# Altium PCB ActuatorMKII.PcbDoc (part 1 of 3)
Units mil, origin at the board's own origin, x right, y up, seen from the top; angles counter-clockwise.
Board outline 7000 x 5000 mil, 4 copper layers (Top Layer, Middle 1 Layer, Middle 2 Layer, Bottom Layer), stack 53.912 mil thick; 139 components, 107 nets, 485 pads, 302 vias.
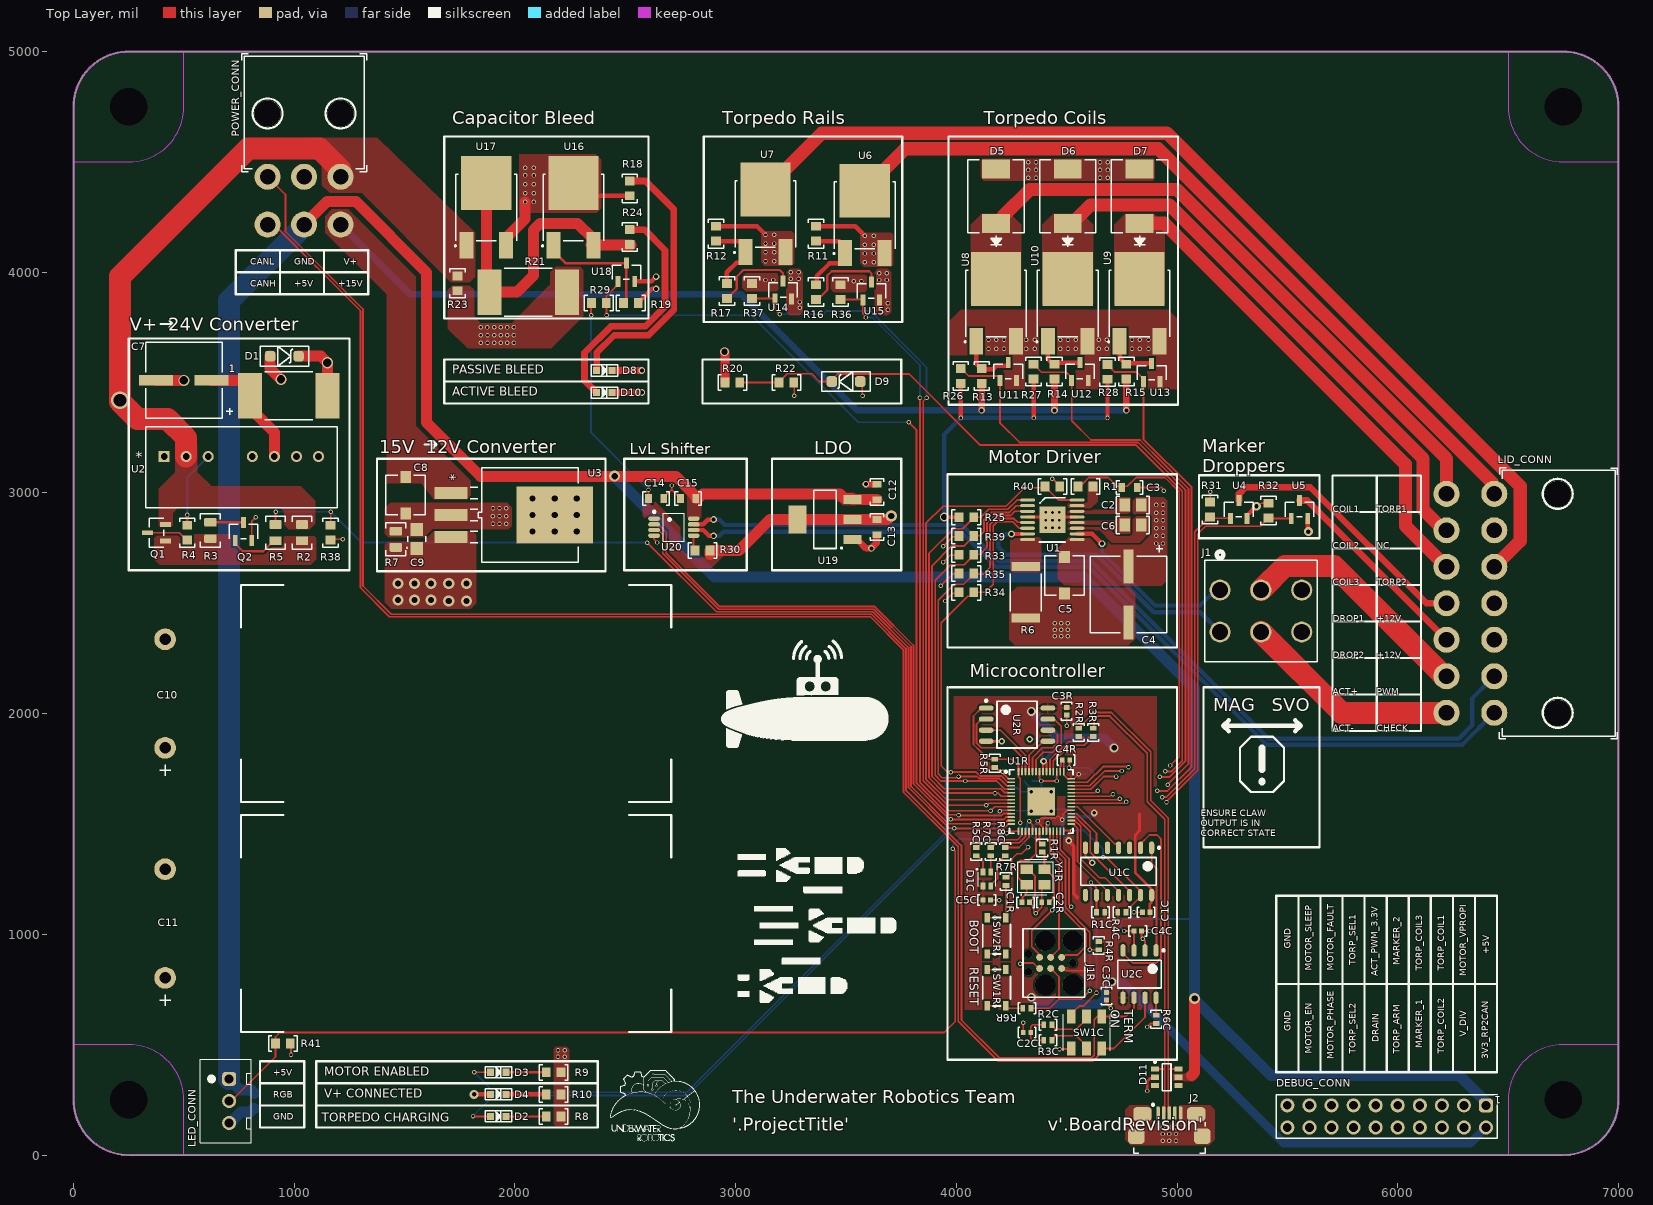
[diagram p0: Top Layer view]
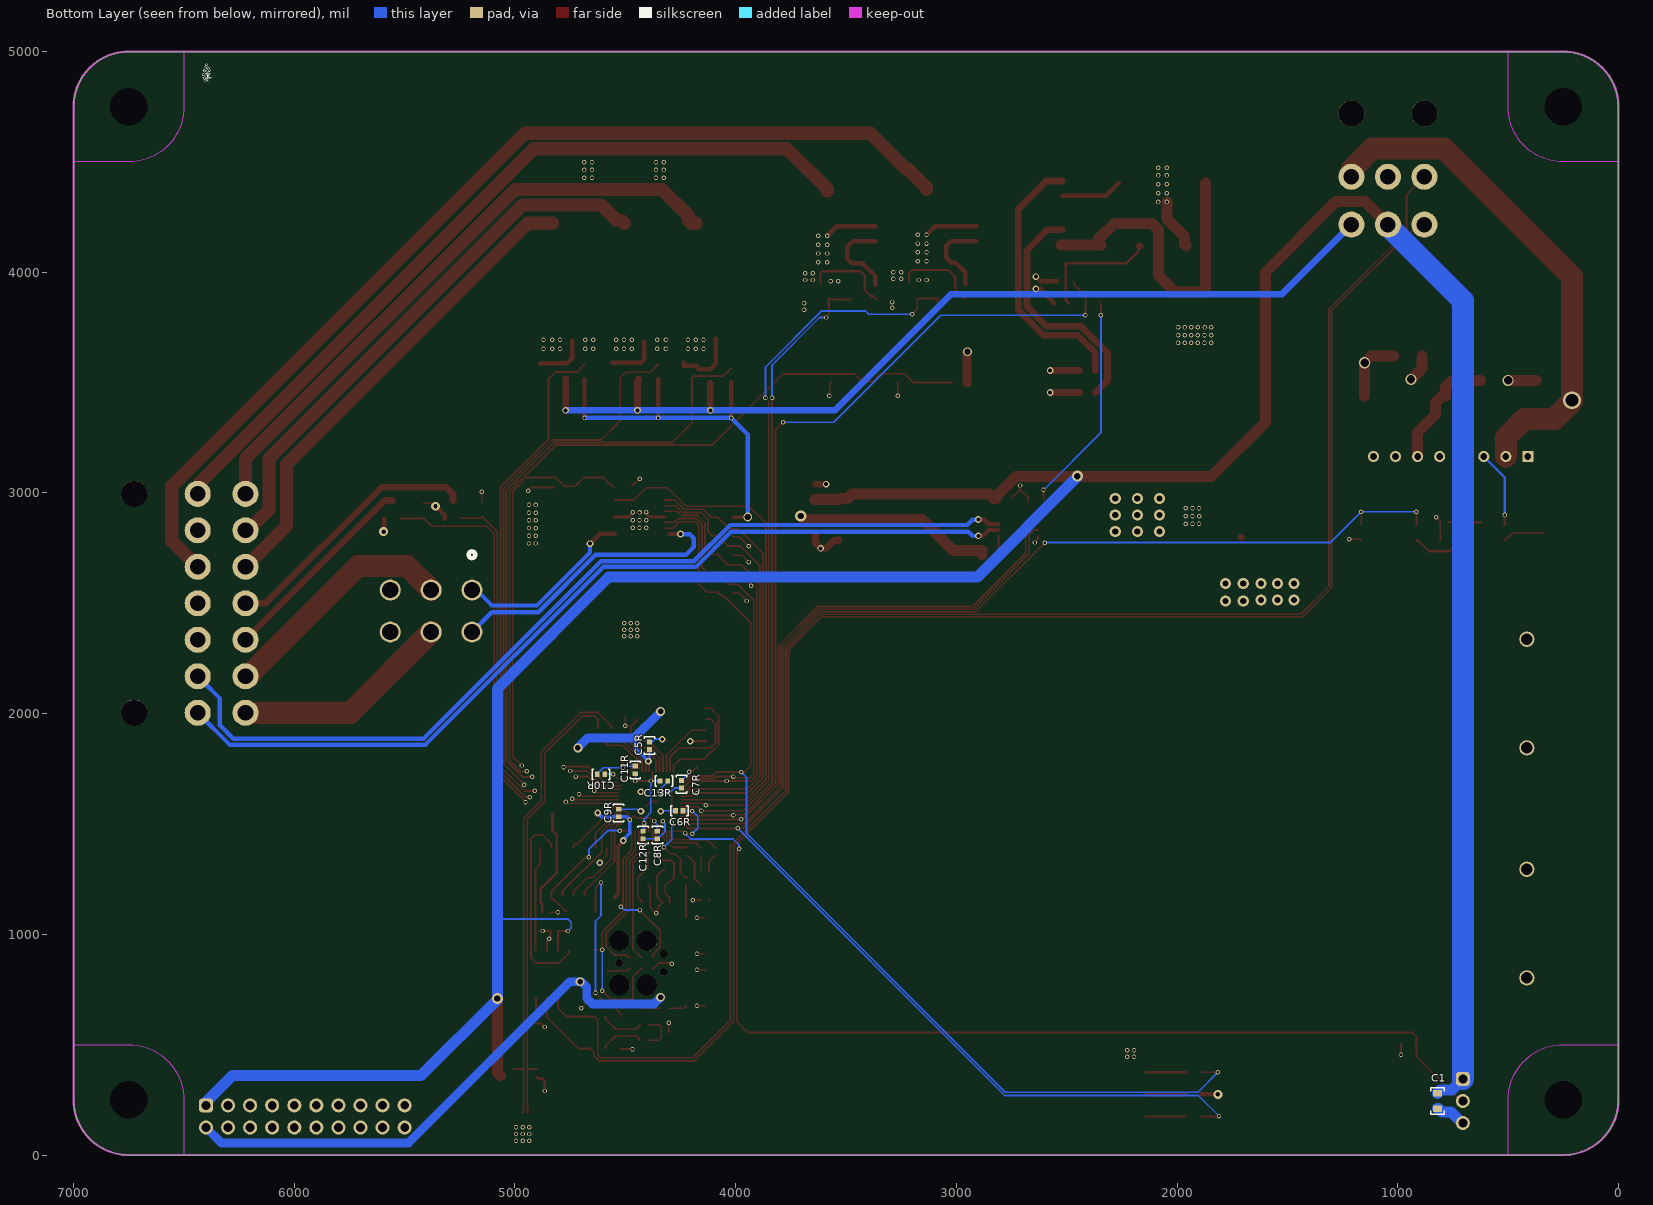
[diagram p1: Bottom Layer view, seen from below]
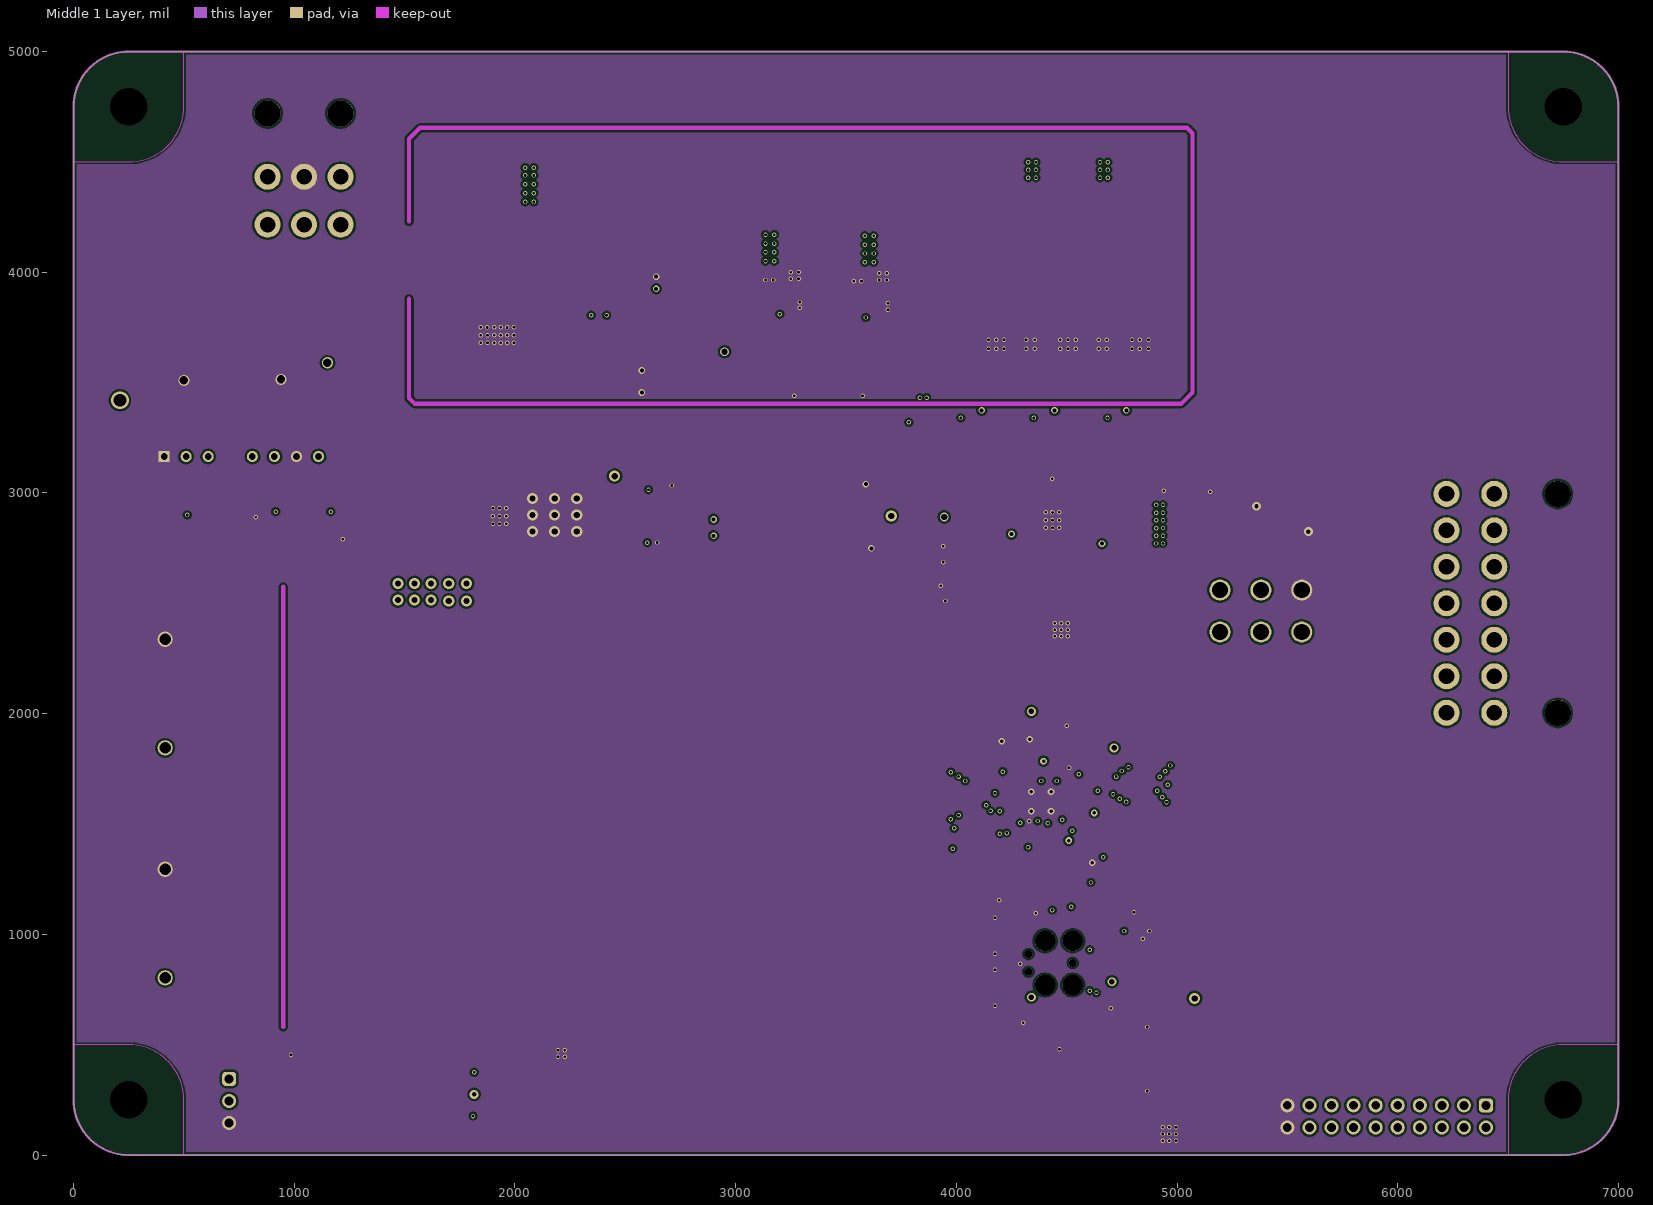
[diagram p2: Middle 1 Layer]
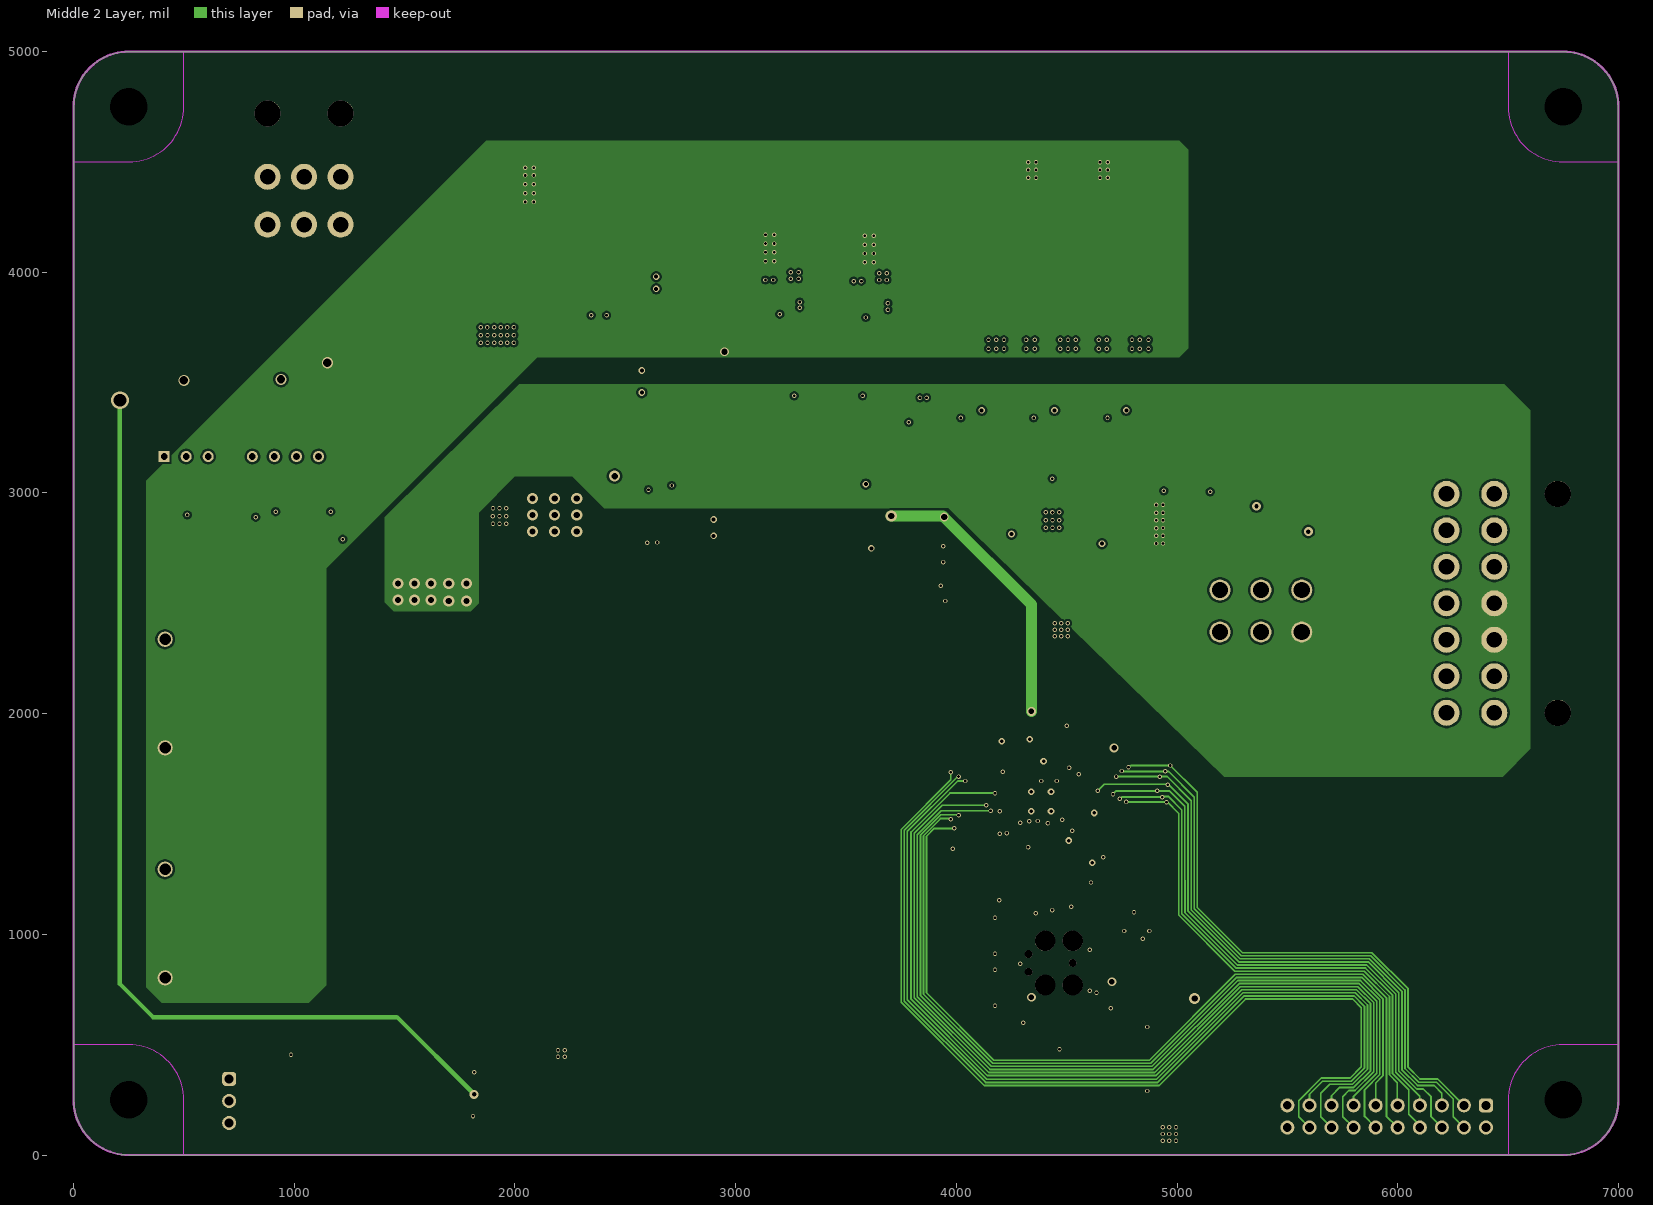
[diagram p3: Middle 2 Layer]
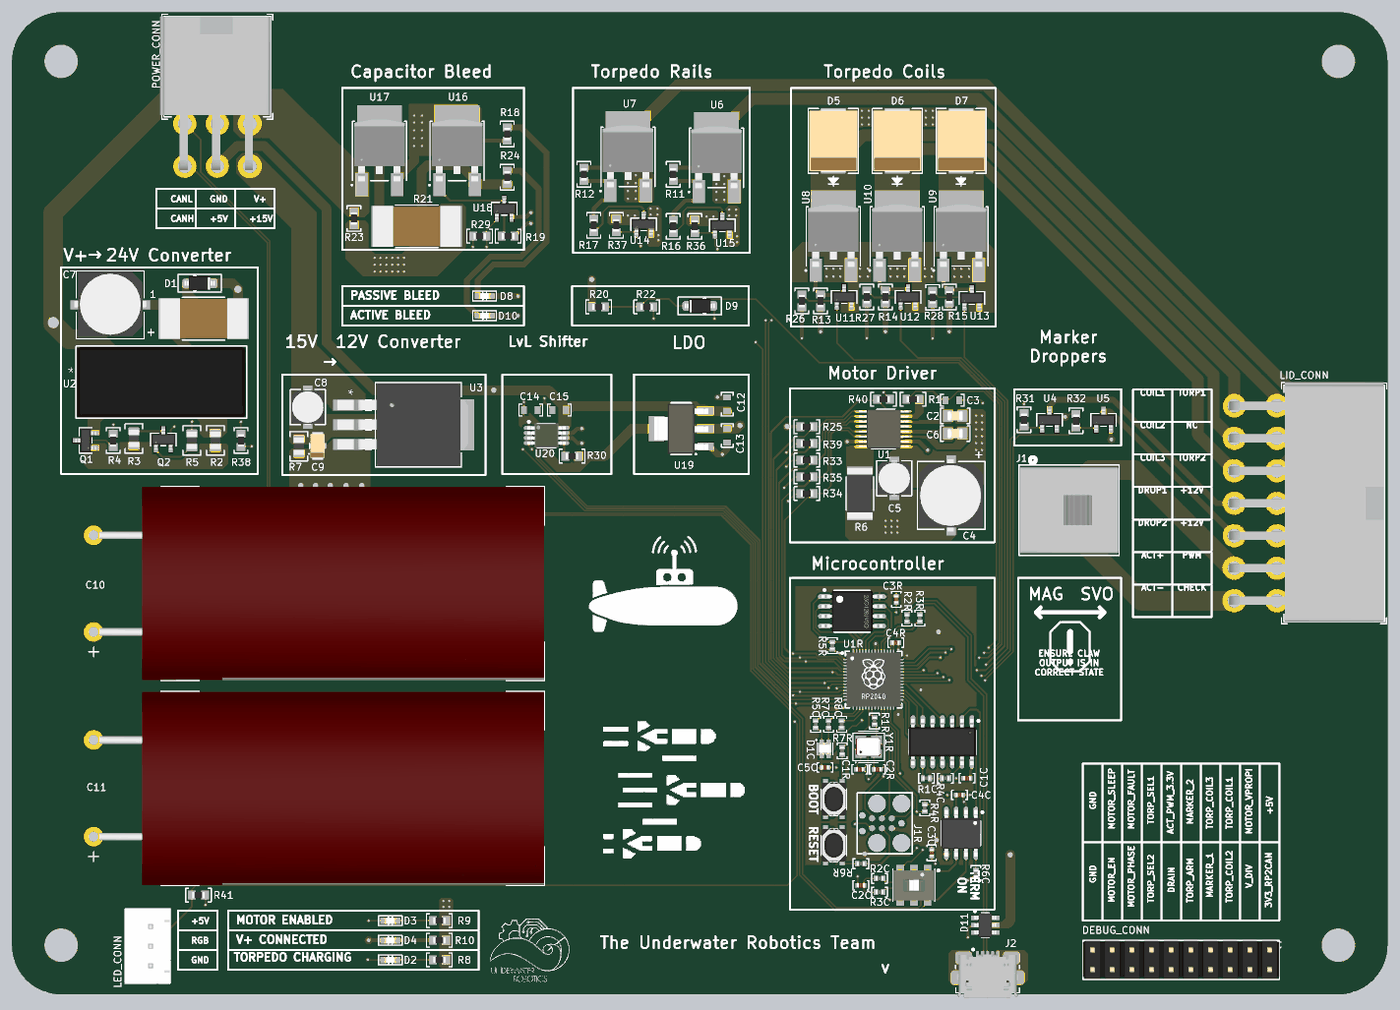
[diagram p5: 3D render of the assembled board from above, using the file's embedded part models]
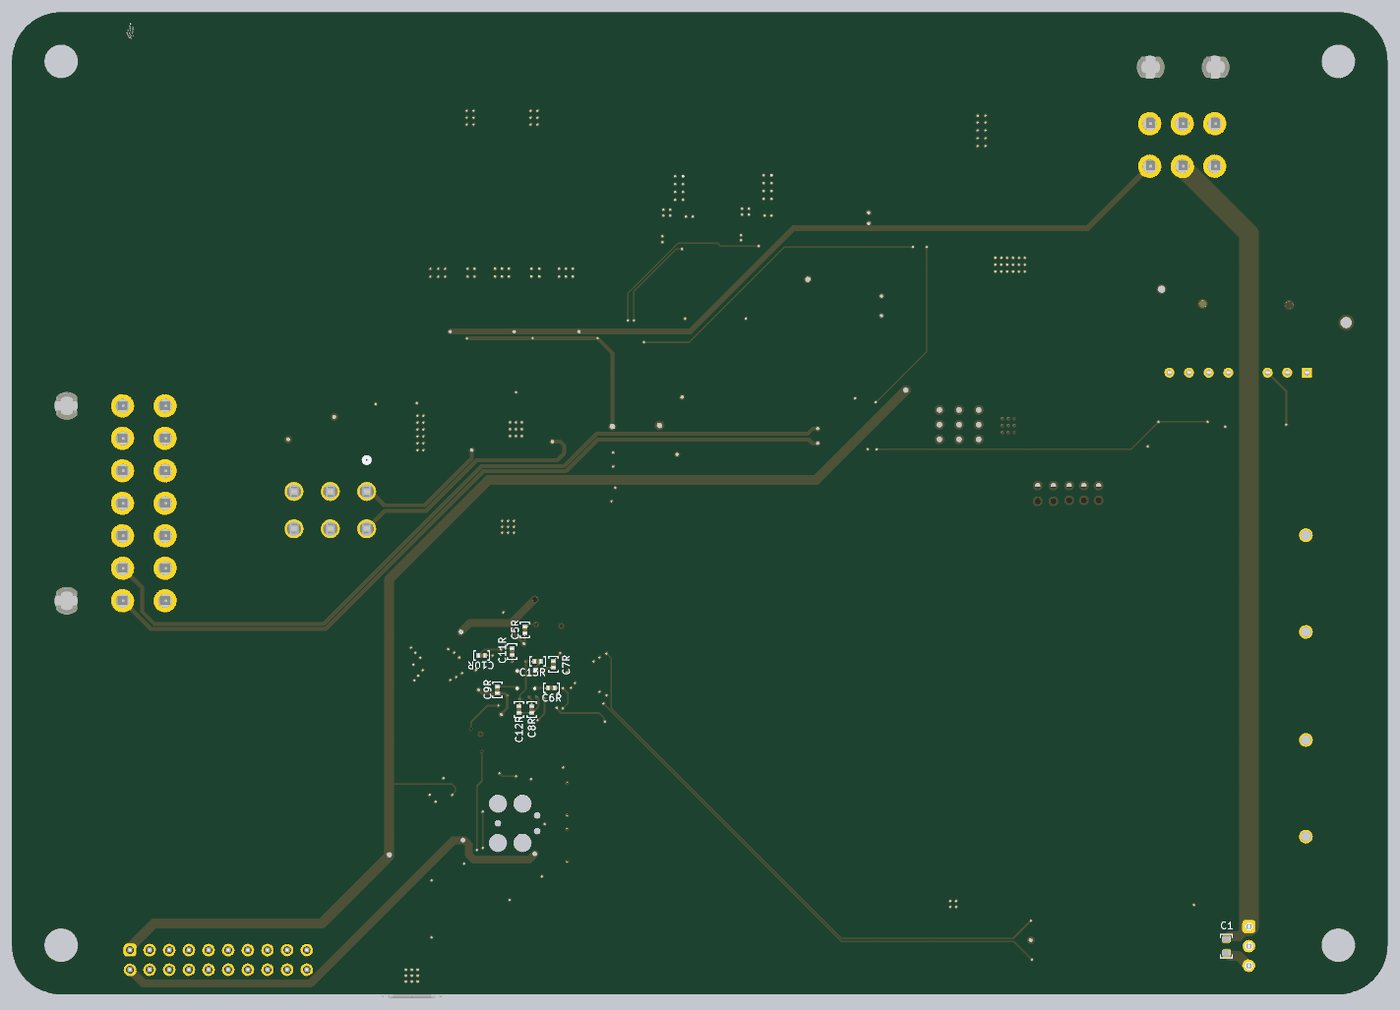
[diagram p6: 3D render of the assembled board from below, using the file's embedded part models]

## Layer stack, top to bottom
Top Solder: solder mask 1, SM-001, Dk 4
Top Layer: signal copper 1.378
Dielectric 1: prepreg 5.1, PP-017, Dk 4.3
Dielectric 2: prepreg 5.1, PP-017, Dk 4.3
Middle 1 Layer: signal copper 1.378
Dielectric 3: core 28, Core-039, Dk 4.8
Middle 2 Layer: signal copper 1.378
Dielectric 4: prepreg 5.1, PP-017, Dk 4.3
Dielectric 5: prepreg 5.1, PP-017, Dk 4.3
Bottom Layer: signal copper 1.378
Bottom Solder: solder mask 1, SM-001, Dk 4

## Board outline
0,250 0,4750 cw(c250,4750) 250,5000 6750,5000 cw(c6750,4750) 7000,4750 7000,250 cw(c6750,250) 6750,0 250,0 cw(c250,250)

## Design rules (kind name [scope] priority, off if disabled: settings)
Clearance "Clearance JLCPCB 4layer 1oz" [All] p1: gap=10 ignorepadtopadclearanceinfootprint=FALSE except(3.5: Arc-Arc Arc-Track Track-Track; 5: Arc-SMDPad Track-SMDPad SMDPad-SMDPad; 6: Arc-Via Track-Via SMDPad-Via)
DiffPairsRouting [All] p1: maxlimit=10 minlimit=6 mostfreqgap=8 toplayer_minwidth=8 toplayer_maxwidth=15 toplayer_prefwidth=8 midlayer1_minwidth=8 midlayer1_maxwidth=15 midlayer1_prefwidth=8 midlayer2_minwidth=8 midlayer2_maxwidth=15 midlayer2_prefwidth=8 bottomlayer_minwidth=8 bottomlayer_maxwidth=15 bottomlayer_prefwidth=8 maxuncoupledlength=500
HoleSize [All] p1: absolutevalues=TRUE maxlimit=200 minlimit=12 maxpercent=80.000 minpercent=20.000
MinimumSolderMaskSliver [All] p1: minsoldermaskwidth=3
PlaneConnect [All] p1: pad.planeconnectstyle=Relief pad.reliefexpansion=20 pad.reliefentries=4 pad.reliefconductorwidth=10 pad.reliefairgap=10 via.planeconnectstyle=Direct via.reliefexpansion=20 via.reliefentries=4 via.reliefconductorwidth=10 via.reliefairgap=10
PolygonConnect "PolygonConnect 3V3" [InNet('3V3_RP2CAN')] p1: thpad.connectstyle=Relief thpad.reliefconductorwidth=10 thpad.reliefentries=4 thpad.polygonreliefangle="90 Angle" thpad.airgapwidth=10 smdpad.connectstyle=Relief smdpad.reliefconductorwidth=10 smdpad.reliefentries=4 smdpad.polygonreliefangle="90 Angle" smdpad.airgapwidth=10 via.connectstyle=Direct via.reliefconductorwidth=10 via.reliefentries=4 via.polygonreliefangle="90 Angle" via.airgapwidth=10
PolygonConnect [All] p2: connectstyle=Direct reliefconductorwidth=15 reliefentries=4 polygonreliefangle="45 Angle" airgapwidth=10
RoutingVias [All] p1: holewidth=28 width=50 viastyle="Through Hole" minholewidth=28 minwidth=50 maxholewidth=28 maxwidth=50
SilkToSilkClearance [All] p1: silktosilkclearance=3
SilkToSolderMaskClearance [IsPad] p1: minsilkscreentomaskgap=6 clearancetoexposedcopper=TRUE
SolderMaskExpansion [All] p1: expansion=2 istentingtop=FALSE
Width "Width JLCPCB 4layer 1oz" [All] p1: maxlimit=500 minlimit=3.5 preferedwidth=10 minimp=50.000000 maximp=50.000000 favimp=50.000000
24 further rules are at their usual default settings.

## Classes and differential pairs
differential pair class "USB 2.0": USB USB_RP2040
component class U_RP2040_with_CAN: C1C C2C C3C C4C C5C D1C R1C R2C R3C R4C R5C R6C R7C R8C SW1C U1C U2C
component class U_RP2040_C: C1R C2R C3R C4R C5R C6R C7R C8R C9R C10R C11R C12R C13R J1R R1R R2R R3R R4R R5R R6R R7R SW1R SW2R U1R U2R Y1R
component class U_ActuatorMKII_Torpedoes: C10 C11 D5 D6 D7 D8 D9 D10 R11 R12 R13 R14 R15 R16 R17 R18 R19 R20 R21 R22 R23 R24 U6 U7 U8 U9 U10 U11 U12 U13 U14 U15 U16 U17 U18
component class U_ActuatorMKII_Microcontroller: C12 C13 C14 C15 D11 J2 R25 R26 R27 R28 R29 R30 R31 R32 R33 R34 R35 R36 R37 R38 R39 R40 R41 U19 U20
component class ActuatorMKII_Connectors: C1 DEBUG_CONN LED_CONN LID_CONN POWER_CONN
component class U_ActuatorMKII_Circuits: 1 C2 C3 C4 C5 C6 C7 C8 C9 D1 D2 D3 D4 J1 Q1 Q2 R1 R2 R3 R4 R5 R6 R7 R8 R9 R10 U1 U2 U3 U4 U5
differential pair USB: +USB_P -USB_N
differential pair USB_RP2040: +USB_RP2040_P -USB_RP2040_N

## Components (designator, comment, footprint, x,y, rotation, side; value= is the part's Value field where it differs from the comment)
1 "3550120RJT" RES_3550_TEC 975,3440 r0 top
C1 "10uF Ceramic 6.3V" CAPACITOR_0603 820,245 r270 bottom
C1C "100nF Ceramic 25V" CAPACITOR_0402 4860,1100 r180 top value=0.1uF
C1R "27pF Ceramic 50V" CAPACITOR_0402 4314.11,1145 r0 top value=27pF
C2 "100nF Ceramic 50V" CAPACITOR_0805 4800,2945 r0 top value=0.1uF
C2C "4700pF Ceramic 25V" CAPACITOR_0402 4320,555 r0 top value=4.7nF
C2R "27pF Ceramic 50V" CAPACITOR_0402 4404.11,1145 r180 top value=27pF
C3 "1000pF Ceramic 50V" CAPACITOR_0603 4785,3025 r0 top value=1000pF
C3C "100nF Ceramic 25V" CAPACITOR_0402 4680,720 r270 top value=0.1uF
C3R "100nF Ceramic 6.3V" CAPACITOR_0402 4500,2011.01 r270 top value=0.1uF
C4 "100uF electrolytic 35 V" PCAP_8x5.4-ELECT_NCA 4780,2540 r270 top value=100uF
C4C "100nF Ceramic 25V" CAPACITOR_0402 4822.13,1015 r0 top value=0.1uF
C4R "1uF Ceramic 16V" CAPACITOR_0402 4496.98,1790 r0 top value=1uF
C5 "0.1uF electrolytic 35 V" U2-D_NCH 4490,2627 r270 top value=0.1uF
C5C "1uF Ceramic 16V" CAPACITOR_0402 4137.7,1155 r0 top value=1uF
C5R "100nF Ceramic 6.3V" CAPACITOR_0402 4390,1855 r90 bottom value=0.1uF
C6 "100nF Ceramic 50V" CAPACITOR_0805 4800,2855 r180 top value=0.1uF
C6R "100nF Ceramic 6.3V" CAPACITOR_0402 4255,1560 r0 bottom value=0.1uF
C7 "47uF Electrolytic 50V" PCAP_8x5.4-ELECT_NCA 500,3510 r180 top value=47uF
C7R "100nF Ceramic 6.3V" CAPACITOR_0402 4245,1680 r270 bottom value=0.1uF
C8 "0.1uF electrolytic 35 V" U2-D_NCH 1505,2990 r270 top value=0.1uF
C8R "100nF Ceramic 6.3V" CAPACITOR_0402 4355,1450 r270 bottom value=0.1uF
C9 "10uF Tantalum 16V" "CAPACITOR_1206 - POLAR" 1555,2791.48 r90 top
C9R "100nF Ceramic 6.3V" CAPACITOR_0402 4530,1550 r90 bottom value=0.1uF
C10 "Cap 22000uF 22V +/-20% Aluminum" UVK1E223MRD_RA 415,1845 r90 top value=22000uF
C10R "100nF Ceramic 6.3V" CAPACITOR_0402 4610,1725 r0 bottom value=0.1uF
C11 "Cap 22000uF 22V +/-20% Aluminum" UVK1E223MRD_RA 415,802.87 r90 top value=22000uF
C11R "1uF Ceramic 16V" CAPACITOR_0402 4455,1745 r90 bottom value=1uF
C12 "10uF Ceramic 6.3V" CAPACITOR_0603 3640,3005 r90 top
C12R "100nF Ceramic 6.3V" CAPACITOR_0402 4420,1450 r270 bottom value=0.1uF
C13 "10uF Ceramic 6.3V" CAPACITOR_0603 3640,2845 r270 top
C13R "100nF Ceramic 6.3V" CAPACITOR_0402 4325,1695 r180 bottom value=0.1uF
C14 "100nF Ceramic 6.3V" CAPACITOR_0603 2640,2975 r0 top value=0.1uF
C15 "100nF Ceramic 6.3V" CAPACITOR_0603 2785,2975 r180 top value=0.1uF
D1 "Zener_Diode_10V_410mW" SOD-123 955,3620 r0 top
D1C "EAST1616RGBB4" LED_0606_4SMD 4138.29,1250 r270 top
D2 "150060BS75000" LED_0603 1925,175 r0 top
D3 "IN-S63AT5G" LED_0603 1925,375 r0 top
D4 "IN-S63AT5G" LED_0603 1925,275 r0 top
D5 "B330-13-F" DO-214AB 4180,4345 r90 top
D6 "B330-13-F" DO-214AB 4505,4345 r90 top
D7 "B330-13-F" DO-214AB 4830,4345 r90 top
D8 "150060RS75000" LED_0603 2405,3555 r0 top
D9 "Zener_Diode_3.3V_250mW_1" SOD-123 3500,3505 r180 top
D10 "150060RS75000" LED_0603 2405,3455 r0 top
D11 "TVS DIODE 5VWM 25VC SOT23-6" "SOT 23-6L" 4953.15,352.4 r0 top
DEBUG_CONN "HEADER DUAL VERT 2.54MM" HEADER_2x10PIN_2.54MM 6400,225 r180 top
J1 "Slide Switch 6A 28V DPDT Through Hole" CONN_S3CQE2 5194.96,2560.16 r270 top
J1R "TagConnect SWD" TC2030-MCP 4527.13,870.5 r180 top
J2 "USB_MICRO R/A" CONN_MINIUSB 4965,85 r0 top
LED_CONN "XH2.54 VERT" CONN_JST_XH254_3POS_VERT 705,345 r270 top
LID_CONN "Mini-Fit Jr R/A" "CONN_MOLEX_MINIFIT JR_14 POS_R/A" 6473.03,2500 r90 top locked
POWER_CONN "Mini-Fit Jr R/A" "CONN_MOLEX_MINIFIT JR_6 POS_R/A" 1210,4720 r180 top locked
Q1 "DMP3056L-7" SOT-23-3 375,2820 r90 top
Q2 "AO3404A" SOT-23-3 770,2825 r0 top
R1 "100k Ohm 5% 1/8W" RESISTOR_0603 4585,3030 r0 top
R1C "10k Ohm 1% 1/16W" RESISTOR_0402 4653.7,1100 r180 top
R1R "1k Ohm 1% 1/16W" RESISTOR_0402 4389.11,1391.3 r270 top
R2 "5.1k Ohm 1% 1/8W" RESISTOR_0805 1035,2820 r270 top
R2C "60.4 Ohm 1% 1/16W" RESISTOR_0402 4415,590 r180 top
R2R "27 Ohm 1% 1/16W" RESISTOR_0402 4553.99,1915 r270 top
R3 "33k Ohm 5% 1/8W" RESISTOR_0805 620,2830 r90 top
R3C "60.4 Ohm 1% 1/16W" RESISTOR_0402 4415,520 r180 top
R3R "27 Ohm 1% 1/16W" RESISTOR_0402 4620,1915 r270 top
R4 "7.5k Ohm 5% 1/10W" RESISTOR_0603 515,2820 r90 top
R4C "10k Ohm 1% 1/16W" RESISTOR_0402 4750,1100 r0 top
R4R "10k Ohm 1% 1/16W" RESISTOR_0402 4645,948.7 r270 top
R5 "5.1k Ohm 1% 1/8W" RESISTOR_0805 915,2820 r270 top
R5C "604 Ohm 1% 1/16W" RESISTOR_0402 4090,1375 r270 top
R5R "10k Ohm 1% 1/16W" RESISTOR_0402 4175,1775 r90 top
R6 "0.2 Ohm 1% 2W 2512" RESISTOR_2512 4315,2550 r90 top
R6C "10k Ohm 1% 1/16W" RESISTOR_0402 4905,615 r270 top
R6R "1k Ohm 1% 1/16W" RESISTOR_0402 4320,665 r0 top
R7 "1.2k Ohm 5% 1/2W" RESISTOR_0805 1460,2790 r90 top
R7C "200 Ohm 1% 1/16W" RESISTOR_0402 4156.01,1375 r270 top
R7R "1k Ohm 1% 1/16W" RESISTOR_0402 4225,1240 r90 top
R8 "62 Ohm 1% 1/4W" RESISTOR_0603 2175,175 r0 top
R8C "200 Ohm 1% 1/16W" RESISTOR_0402 4222.02,1375 r270 top
R9 "62 Ohm 1% 1/4W" RESISTOR_0603 2175,375 r0 top
R10 "4.7k Ohm 5% 1/10W" RESISTOR_0603 2175,275 r0 top
R11 "10k Ohm 5% 1/10W" RESISTOR_0603 3365,4175 r270 top
R12 "10k Ohm 5% 1/10W" RESISTOR_0603 2910,4175 r270 top
R13 "10k Ohm 5% 1/10W" RESISTOR_0603 4115,3530 r90 top
R14 "10k Ohm 5% 1/10W" RESISTOR_0603 4445,3550 r90 top
R15 "10k Ohm 5% 1/10W" RESISTOR_0603 4770,3550 r90 top
R16 "10k Ohm 5% 1/10W" RESISTOR_0603 3365,3910 r270 top
R17 "10k Ohm 5% 1/10W" RESISTOR_0603 2960,3915 r270 top
R18 "4.7k Ohm 5% 1/10W" RESISTOR_0603 2520,4380 r270 top
R19 "10k Ohm 5% 1/10W" RESISTOR_0603 2525,3860 r180 top
R20 "100k Ohm 0.5% 1/10W" RESISTOR_0603 2985,3500 r0 top
R21 "3560100RJT" RES_3550_TEC 2060,3910 r0 top
R22 "12k Ohm 0.5% 1/10W" RESISTOR_0603 3230,3500 r0 top
R23 "100k Ohm 5% 1/8W" RESISTOR_0603 1740,3950 r270 top
R24 "10k Ohm 5% 1/10W" RESISTOR_0603 2520,4160 r270 top
R25 "10k Ohm 5% 1/10W" RESISTOR_0603 4045,2890 r0 top
R26 "10k Ohm 5% 1/10W" RESISTOR_0603 4020,3530 r90 top
R27 "10k Ohm 5% 1/10W" RESISTOR_0603 4350,3550 r90 top
R28 "10k Ohm 5% 1/10W" RESISTOR_0603 4685,3548.5 r90 top
R29 "10k Ohm 5% 1/10W" RESISTOR_0603 2380,3860 r0 top
R30 "10k Ohm 5% 1/10W" RESISTOR_0603 2850,2740 r180 top
R31 "10k Ohm 5% 1/10W" RESISTOR_0603 5150,2925 r270 top
R32 "10k Ohm 5% 1/10W" RESISTOR_0603 5415,2920 r270 top
R33 "10k Ohm 5% 1/10W" RESISTOR_0603 4045,2720 r0 top
R34 "10k Ohm 5% 1/10W" RESISTOR_0603 4045,2550 r0 top
R35 "10k Ohm 5% 1/10W" RESISTOR_0603 4045,2635 r0 top
R36 "10k Ohm 5% 1/10W" RESISTOR_0603 3475,3910 r270 top
R37 "10k Ohm 5% 1/10W" RESISTOR_0603 3075,3915 r270 top
R38 "10k Ohm 5% 1/10W" RESISTOR_0603 1165,2820 r90 top
R39 "10k Ohm 5% 1/10W" RESISTOR_0603 4045,2805 r0 top
R40 "10k Ohm 5% 1/10W" RESISTOR_0603 4435,3030 r180 top
R41 "10k Ohm 5% 1/10W" RESISTOR_0603 948.5,505 r180 top
SW1C "Switch DPDT" CAS-220TA 4590,555 r180 top
SW1R "434123025826" SMD_434123025826 4182.32,758.31 r270 top
SW2R "434123025826" SMD_434123025826 4182.32,993.31 r270 top
U1 "DRV8801PWPR" PWP0016B 4435,2878.5 r0 top
U1C "MCP2517FD" SOIC-14 4735,1285 r270 top
U1R "RP2040" "QFN-56 RP2040" 4384.5,1602.13 r0 top locked
U2 "TMR 6-2415" "TMR 6_TRP" 410,3165 r0 top
U2C "CAN Transceiver" SOIC-8 4830,820 r270 top
U2R "W25Q128JVSIQ" "SOIC-8 W25QxJV" 4275,1950.14 r0 top
U3 "MIC29300-12WU-TR" TO-263-3_MCH 2068,2900 r270 top
U4 "AO3404A" SOT-23-3 5280,2925 r0 top
U5 "AO3404A" SOT-23-3 5555,2925 r0 top
U6 "FDD4141" DPAK_ONS 3585,4260 r0 top
U7 "FDD4141" DPAK_ONS 3135,4265 r0 top
U8 "MOSFET N-Ch 100V 13A TO252-3" DPAK_ONS 4180,3860 r0 top
U9 "MOSFET N-Ch 100V 13A TO252-3" DPAK_ONS 4830,3860 r0 top
U10 "MOSFET N-Ch 100V 13A TO252-3" DPAK_ONS 4505,3860 r0 top
U11 "AO3404A" SOT-23-3 4235,3550 r0 top
U12 "AO3404A" SOT-23-3 4560,3550 r0 top
U13 "AO3404A" SOT-23-3 4885,3545 r0 top
U14 "AO3404A" SOT-23-3 3215,3920 r0 top
U15 "AO3404A" SOT-23-3 3615,3915 r0 top
U16 "MOSFET N-Ch 100V 13A TO252-3" DPAK_ONS 2265,4295 r0 top
U17 "FDD4141" DPAK_ONS 1870,4295 r0 top
U18 "AO3404A" SOT-23-3 2505,4000 r0 top
U19 "LM1117IMPX-3.3/NOPB" SOT-223-4 3405,2880 r180 top
U20 "IC TRANSLTR BIDIRECTIONAL 8MSOP" MSOP-8_PI4ULS5V202UEX 2720,2845 r0 top
Y1R "CRYSTAL 12.0000MHZ 18PF SMD" "4-SMD, NO LEAD CRYSTAL 3.2x2.5mm" 4319.11,1225 r0 top

## Footprints (in the part's own frame and the unit in brackets; to place one, negate y for a bottom-side part, rotate by r counter-clockwise, add the part's x,y. Pads: shape width x height; smd on the part's side, far side on the other; paste and mask are expansions set on the pad)
"4-SMD, NO LEAD CRYSTAL 3.2x2.5mm" [mm]
  rrect0% 1.4x1.1 smd: 1(0,0) 2(2.032,0) 3(2.032,1.778) 4(0,1.778)
  silkscreen extent -1.02,-1.2 3.05,2.92, body extent -0.58,-0.36 2.62,2.14, height 0.82
CAPACITOR_0402 [mm]
  rect 0.56x0.6 smd: 1(-0.435,0) 2(0.435,0)
  silkscreen extent -1.02,-0.6 1.02,0.6, body extent -0.5,-0.28 0.5,0.27, height 0.51
CAPACITOR_0603 [mil] "CAPACITOR 0603"
  rect 30x40 smd: 1(-35,0) 2(35,0)
  silkscreen extent -60,-30 60,30, body extent -31,-16 31,16, height 31
CAPACITOR_0805 [mm] "CAPACITOR 0805"
  rect 1.2x1.5 smd: 1(-0.95,0) 2(0.95,0)
  silkscreen extent -1.91,-1 1.9,1, body extent -1,-0.62 1,0.63, height 1.26
"CAPACITOR_1206 - POLAR" [mil]
  rect 58.96x55 smd paste+0 mask+0: 1(-43.52,0) 2(43.52,0)
  silkscreen extent -44,-40 12,48, body extent -67,-36 67,36, height 73
CAS-220TA [mm] "SWITCH SLIDE DPDT 100MA 6V"
  rrect0% 1x1.6 smd: 1(-1.75,-1.85) 2(0,-1.85) 3(1.75,-1.85) 4(-1.75,1.85) 5(0,1.85) 6(1.75,1.85)
  silkscreen extent -3.3,-2.1 2.7,2.1, body extent -2.7,-2.1 2.7,2.1, height 2.51
CONN_JST_XH254_3POS_VERT [mm] "JST XH 2.54mm Pitch 3 Pos Vertical"
  rrect50% 1.62x1.62 hole 1.02: 1(0,0)
  round 1.62 hole 1.02: 2(2.54,0) 3(5.08,0)
  silkscreen extent -2.29,-3.3 7.37,2.54, body extent -2.34,-3.35 7.42,2.49, height 7.21
CONN_MINIUSB [mm] "USB2.0 Micro-B Receptacle SMD R/A"
  rrect50% 0.4x1.5 smd: 1(-1.3,2.675) 2(-0.65,2.675) 3(0,2.675) 4(0.65,2.675) 5(1.3,2.675)
  rrect50% 2.1x1.6 smd: 6(-3.1,2.55) 7(3.1,2.55)
  rrect50% 1.9x1.8 smd: 8(3.8,0) 9(-3.8,0)
  silkscreen extent -4.14,-1.96 4.11,3.75, body extent -3.96,-2.67 3.96,2.99, height 2.72
"CONN_MOLEX_MINIFIT JR_6 POS_R/A" [mm] "Molex Minifit Jr 5569 6 Pos R/A"
  round 3 hole 1.801: 1(8.4,7.3) 4(8.4,12.8)
  round 3 hole 1.8: 2(4.2,7.3) 3(0,7.3) 5(4.2,12.8) 6(0,12.8)
  round 3 hole 3 unplated mask+0: ""(0,0) ""(8.4,0)
  silkscreen extent -2.98,-6.86 11.38,6.73, body extent -2.58,-6.6 11.62,13.33, height 11.4
"CONN_MOLEX_MINIFIT JR_14 POS_R/A" [mm] "Molex Minifit Jr 5569 14 Pos R/A"
  round 3 hole 1.801: 1(12.6,0.9) 2(8.4,0.9) 3(4.2,0.9) 4(0,0.9) 8(12.6,6.4) 9(8.4,6.4) 10(4.2,6.4) 11(0,6.4)
  round 3 hole 1.8: 5(-4.2,0.9) 6(-8.4,0.9) 7(-12.6,0.9) 12(-4.2,6.4) 13(-8.4,6.4) 14(-12.6,6.4)
  round 3 hole 3 unplated mask+0: ""(-12.6,-6.4) ""(12.6,-6.4)
  silkscreen extent -15.58,-13.27 15.61,0.33, body extent -15.3,-12.9 15.7,7.04, height 11.4
CONN_S3CQE2 [mm]
  round 2.424 hole 1.85 mask+0: 1(4.83,0) 2(4.83,4.7) 3(4.83,9.4) 4(0,0) 5(0,4.7) 6(0,9.4)
  silkscreen extent -4.44,-1.78 8.26,11.18, body extent -3.29,-1.65 8.12,11.05, height 11.2
DO-214AB [mil]
  rect 86x126 smd paste+0 mask+0: 1(-123,0) 2(123,0)
  silkscreen extent -230,-128 165,128, body extent -160,-123 160,123, height 105
DPAK_ONS [mil]
  rect 63x118 smd: 1(-90,-172.5) 2(90,-172.5)
  rect 228x244 smd: 3(0,109.5)
  silkscreen extent -142,-177 138,150, body extent -128,-156 129,160, height 94
HEADER_2x10PIN_2.54MM [mm]
  rrect50% 1.62x1.62 hole 1.02: 1(0,0)
  round 1.62 hole 1.02: 2(0,2.54) 3(2.54,0) 4(2.54,2.54) 5(5.08,0) 6(5.08,2.54) 7(7.62,0) 8(7.62,2.54)
  round 1.62 hole 1: 9(10.16,0) 10(10.16,2.54) 11(12.7,0) 12(12.7,2.54) 13(15.24,0) 14(15.24,2.54) 15(17.78,0) 16(17.78,2.54) 17(20.32,0) 18(20.32,2.54) 19(22.86,0) 20(22.86,2.54)
  silkscreen extent -1.27,-1.25 24.13,3.79, body extent -1.27,-1.25 24.13,3.75, height 7.01
LED_0603 [mil] "LED 0603"
  rect 32x32 smd: 1(-35,0) 2(35,0)
  silkscreen extent -60,-25 60,25, body extent -31,-16 32,16, height 28
LED_0606_4SMD [mm]
  rrect0% 0.8x0.55 smd: 1(-0.8,-0.45) 2(-0.8,0.45) 3(0.8,0.45) 4(0.8,-0.45)
  silkscreen extent -1.22,-1.22 0.8,1.02, body extent -0.8,-0.8 0.8,0.8, height 0.35
MSOP-8_PI4ULS5V202UEX [mm] "TSOP, 8-Leads, Body 3.00x3.00mm, Pitch 0.65mm, IPC Medium Density"
  oval 1.35x0.5 smd: 1(-2.275,0.975) 2(-2.275,0.325) 3(-2.275,-0.325) 4(-2.275,-0.975) 5(2.275,-0.975) 6(2.275,-0.325) 7(2.275,0.325) 8(2.275,0.975)
  silkscreen extent -2.4,-1.6 1.2,1.9, body extent -2.47,-1.55 2.47,1.55, height 1.06
PCAP_8x5.4-ELECT_NCA [mil]
  rect 154x47 smd paste+0 mask+0: 1(-126,0) 2(126,0)
  silkscreen extent -222,-173 173,173, body extent -183,-167 183,160, height 219
PWP0016B [mm]
  oval 1.7x0.35 smd paste-0.102 mask+0.051: 1(-2.85,2.275) 2(-2.85,1.625) 3(-2.85,0.975) 4(-2.85,0.325) 5(-2.85,-0.325) 6(-2.85,-0.975) 7(-2.85,-1.625) 8(-2.85,-2.275) 9(2.85,-2.275) 10(2.85,-1.625) 11(2.85,-0.975) 12(2.85,-0.325) 13(2.85,0.325) 14(2.85,0.975) 15(2.85,1.625) 16(2.85,2.275)
  rect 3x3 smd paste-0.102 mask+0.051: 17(0,0)
  silkscreen extent -1.5,-2.55 1.5,2.55, body extent -3.16,-2.5 3.26,2.5, height 1
"QFN-56 RP2040" [mm] "QFN, 56-Leads, Body 7.00x7.00mm, Pitch 0.40mm, Thermal Pad 3.10x3.10mm, IPC Medium Density"
  oval 0.875x0.2 smd: 1(-3.437,2.6) 2(-3.437,2.2) 3(-3.437,1.8) 4(-3.437,1.4) 5(-3.437,1) 6(-3.437,0.6) 7(-3.437,0.2) 8(-3.437,-0.2) 9(-3.437,-0.6) 10(-3.437,-1) 11(-3.437,-1.4) 12(-3.437,-1.8) 13(-3.437,-2.2) 14(-3.437,-2.6) 29(3.437,-2.6) 30(3.437,-2.2) 31(3.437,-1.8) 32(3.437,-1.4) 33(3.437,-1) 34(3.437,-0.6) 35(3.437,-0.2) 36(3.437,0.2) 37(3.437,0.6) 38(3.437,1) 39(3.437,1.4) 40(3.437,1.8) 41(3.437,2.2) 42(3.437,2.6)
  oval 0.2x0.875 smd: 15(-2.6,-3.437) 16(-2.2,-3.437) 17(-1.8,-3.437) 18(-1.4,-3.437) 19(-1,-3.437) 20(-0.6,-3.437) 21(-0.2,-3.437) 22(0.2,-3.437) 23(0.6,-3.437) 24(1,-3.437) 25(1.4,-3.437) 26(1.8,-3.437) 27(2.2,-3.437) 28(2.6,-3.437) 43(2.6,3.437) 44(2.2,3.437) 45(1.8,3.437) 46(1.4,3.437) 47(1,3.437) 48(0.6,3.437) 49(0.2,3.437) 50(-0.2,3.437) 51(-0.6,3.437) 52(-1,3.437) 53(-1.4,3.437) 54(-1.8,3.437) 55(-2.2,3.437) 56(-2.6,3.437)
  rect 3.2x3.2 smd: 57(0,0)
  silkscreen extent -4.19,-3.65 3.65,3.65, body extent -3.52,-3.52 3.52,3.52, height 0.85
RES_3550_TEC [mil]
  rect 110x207 smd paste+0 mask+0: 1(-175.5,0) 2(175.5,0)
  silkscreen extent -108,-108 108,108, body extent -222,-104 222,104, height 47
RESISTOR_0402 [mm] "Resistor 0402"
  rect 0.55x0.75 smd: 1(-0.475,0) 2(0.475,0)
  silkscreen extent -1.02,-0.64 1.02,0.64, body extent -0.5,-0.25 0.5,0.25, height 0.25
RESISTOR_0603 [mil] "Resistor 0603"
  rect 40x45 smd: 1(-33.5,0) 2(33.5,0)
  silkscreen extent -65,-35 65,35, body extent -31,-16 32,16, height 16
RESISTOR_0805 [mm]
  rrect25% 1x1.42 smd: 1(-0.935,0) 2(0.935,0)
  silkscreen extent -1.91,-1.14 1.91,1.14, body extent -1.11,-0.67 1.1,0.67, height 0.61
RESISTOR_2512 [mil]
  rect 40x130 smd paste+0 mask+0: 1(-117,0) 2(117,0)
  silkscreen extent -85,-70 85,70, body extent -129,-65 129,65, height 28
SMD_434123025826 [mm]
  rect 1.05x0.65 smd: A1(-2.075,1.075) A2(2.075,1.075) B1(-2.075,-1.075) B2(2.075,-1.075)
  silkscreen extent -2.1,-1.6 2.1,1.6, body extent -2.3,-1.6 2.3,1.6, height 2.5
SOD-123 [mm] "Schottky Diode SOD-123"
  rrect50% 1.2x1.22 smd: 1(-1.635,0) 2(1.635,0)
  silkscreen extent -2.79,-1.14 2.79,1.14, body extent -1.95,-0.9 1.95,0.9, height 1.18
SOIC-8 [mm] "SOIC, 8-Leads, Body 4.90x3.90mm, Pitch 1.27mm, IPC Medium Density"
  oval 1.45x0.6 smd: 1(-2.725,1.905) 2(-2.725,0.635) 3(-2.725,-0.635) 4(-2.725,-1.905) 5(2.725,-1.905) 6(2.725,-0.635) 7(2.725,0.635) 8(2.725,1.905)
  silkscreen extent -2.85,-2.5 1.6,2.88, body extent -3,-2.5 3,2.5, height 1.75
"SOIC-8 W25QxJV" [mm] "SOIC, 8-Leads, Body 5.28x5.28mm, Pitch 1.27mm, IPC Medium Density"
  oval 1.7x0.6 smd: 1(-3.55,1.905) 2(-3.55,0.635) 3(-3.55,-0.635) 4(-3.55,-1.905) 5(3.55,-1.905) 6(3.55,-0.635) 7(3.55,0.635) 8(3.55,1.905)
  silkscreen extent -3.67,-2.7 2.3,2.88, body extent -3.95,-2.62 3.95,2.62, height 1.95
SOIC-14 [mm] "SOIC, 14-Leads, Body 8.65x3.90mm, Pitch 1.27mm, IPC Medium Density"
  oval 1.45x0.6 smd: 1(-2.725,3.81) 2(-2.725,2.54) 3(-2.725,1.27) 4(-2.725,0) 5(-2.725,-1.27) 6(-2.725,-2.54) 7(-2.725,-3.81) 8(2.725,-3.81) 9(2.725,-2.54) 10(2.725,-1.27) 11(2.725,0) 12(2.725,1.27) 13(2.725,2.54) 14(2.725,3.81)
  silkscreen extent -2.85,-4.35 1.6,4.79, body extent -3,-4.4 3,4.4, height 1.7
"SOT 23-6L" [mm] "SOT23, 6-Leads, Body 2.95x2.80mm, Pitch 0.95mm, IPC Medium Density"
  rect 0.95x0.6 smd: 1(-1.35,0.95) 2(-1.35,0) 3(-1.35,-0.95) 4(1.35,-0.95) 5(1.35,0) 6(1.35,0.95)
  silkscreen extent -1.47,-1.55 0.5,1.92, body extent -1.4,-1.55 1.4,1.55, height 1.45
SOT-23-3 [mil]
  rect 22x50 smd paste+0 mask+4: 1(-37.5,-41) 2(37.5,-41) 3(0,41)
  silkscreen extent -65,-33 65,33, body extent -60,-52 60,52, height 44
SOT-223-4 [mm]
  rect 2.05x1 smd paste+0 mask+0.102: 1(-3.175,2.3) 2(-3.175,0) 3(-3.175,-2.3)
  rect 2.05x3.25 smd paste+0 mask+0.102: 4(3.175,0)
  silkscreen extent -1.96,-3.35 1.3,3.35, body extent -3.5,-3.25 3.5,3.25, height 1.68
TC2030-MCP [mil]
  round 31 smd: 1(50,-25) 2(50,25) 3(100,-25) 4(100,25) 5(150,-25) 6(150,25)
  round 34 hole 35 unplated: A(0,0) B(200,40) C(200,-40)
  round 92 hole 93 unplated: D(0,-100) E(125,-100) F(0,100) G(125,100)
  silkscreen extent -55,-155 225,155
"TMR 6_TRP" [mil]
  rect 50x50 hole 30 mask+0: 1(0,0)
  round 50 hole 30 mask+0: 2(100,0) 3(200,0) 5(400,0) 6(500,0) 7(600,0) 8(700,0)
  silkscreen extent -84,-232 784,136, body extent -80,-228 778,130, height 441
TO-263-3_MCH [mil]
  rect 55x150 smd paste+0 mask+0: 1(-100,-358.5) 2(0,-358.5) 3(100,-358.5)
  rect 260x345 smd paste+0 mask+0: 4(0,112)
  silkscreen extent -215,-270 215,219, body extent -210,-411 210,254, height 181
U2-D_NCH [mil]
  rect 55x48 smd paste+0 mask+0: 1(-83,0) 2(83,0)
  silkscreen extent -90,-90 90,90, body extent -91,-84 91,84, height 278
UVK1E223MRD_RA [mm]
  round 2.5 / inner round 1.753 / far side round 1.753 hole 1.3 mask+0: 1(0,0) 2(12.5,0)
  silkscreen extent -6.25,-58.26 18.75,0.63, body extent -6.25,-58.26 18.75,-0.74, height 24.99

## Part data
1: "RES 3550 120R 5%", Mfr_Name="TE Connectivity", Supplier Part Number 1=1866355P, Copyright="Copyright (C) 2022 Ultra Librarian. All rights reserved.", Manufacturer_Part_Number=3550120RJT, RefDes=RefDes, Supplier 1=RSComponents, Type=DEV
C1 C12 C13: library part CAPACITOR_10uF_0603, "Cap 10uF 6.3V +/-20% / Ceramic 0603", Supplier Part Number 1=1276-1119-1-ND, Tolerance="+/- 20%", Value (uF)="10 uF", Voltage=6.3V, ComponentLink1Description=Digikey, ComponentLink1URL=https://www.digikey.com/en/products/detail/samsung-electro-mechanics/CL10A106MQ8NNNC/3886777, Made By="Flip B", Supplier 1=Digi-Key
C1C C3C C3R C4C C5R C6R C7R C8R C9R C10R C12R C13R: library part CAPACITOR_0.1uF_0402, "Cap 100nF 25V +/-10% / Ceramic 0402", Supplier Part Number 1=478-7868-1-ND, Tolerance="+/- 10%", Voltage=25V, Made By="Robert Pafford", Supplier 1=Digi-Key
C1R C2R: library part CAPACITOR_0.000027uF_0402, "Cap 27pF 50V +/-5% / Ceramic 0402", Supplier Part Number 1=445-5589-1-ND, Tolerance="+/- 5%", Voltage=50V, Made By="Robert Pafford", Supplier 1=Digi-Key
C2 C6: library part CAPACITOR_0.1uF_0402_1, "Cap 100nF 50V +/-10% / Ceramic 0805", Supplier Part Number 1=38AH3645, Tolerance="+/- 10%", Voltage=25V, Made By="Robert Pafford", Supplier 1=Newark
C2C: library part CAPACITOR_0.0047uF_0402, "4700 pF +/-10% 25V Ceramic Capacitor X7R 0402", Supplier Part Number 1=478-6195-1-ND, Tolerance="+/- 10%", Voltage=25V, Made By="Robert Pafford", Supplier 1=Digi-Key
C3: library part CAPACITOR_0.001uF_0603, "Cap 1000pF 50V +/-2% / Ceramic 0603", Supplier Part Number 1=C0603C102K5RACTU, Tolerance="+/- 2%", Voltage=50, ComponentLink1Description=Datsheet, ComponentLink1URL=https://datasheets.avx.com/C0GNP0-Dielectric.pdf, Made By="Flip B", Supplier 1="Arrow Electronics"
C4: library part "CAP ALUM 100UF 20% 35V SMD", "100 µF 35 V Aluminum Electrolytic Capacitors Radial, Can - SMD 1000 Hrs", Manufacturer_Part_Number=UCB1V0R1MCL1GS, Mfr_Name=Nichicon, Supplier Part Number 1=85Y4753, Copyright="Copyright (C) 2022 Ultra Librarian. All rights reserved.", Made By="Tyson Nguyen", RefDes=RefDes, Supplier 1=Newark, Type=DEV
C4R C5C C11R: library part CAPACITOR_1uF_0402, "Cap 1uF 16V +/-10% / Ceramic 0402", Supplier Part Number 1=478-0402YD105KAT4ADKR-ND, Tolerance="+/- 10%", Voltage=16V, Made By="Robert Pafford", Supplier 1=Digi-Key
C5 C8: library part "CAP ALUM 0.1UF 20% 35V SMD", "0.1 µF 35 V Aluminum Electrolytic Capacitors Radial, Can - SMD 7000 Hrs @ 105°C", Manufacturer_Part_Number=UCB1V0R1MCL1GS, Mfr_Name=Nichicon, Supplier Part Number 1=493-9956-1-ND, Copyright="Copyright (C) 2022 Ultra Librarian. All rights reserved.", Made By="Tyson Nguyen", RefDes=RefDes, Supplier 1=Digi-Key, Type=DEV
C7: library part CAP_ALUM_47uF, "CAP ALUM 47uF 50V +/-20% / 8x5.4", Supplier Part Number 1=PCE3815CT-ND, Tolerance="+/- 20%", Voltage=6.3V, ComponentLink1Description=Datsheet, ComponentLink1URL=https://www.mouser.com/datasheet/2/212/KEM_C1002_X7R_SMD-1102033.pdf, Made By="Flip B", Supplier 1=Digi-Key
C9: library part CAPACITOR_10uF_1206_Tantalum_1, "Cap 10uF 16V +/-20% / Tantalum 1206", Supplier Part Number 1=26AC4143, Tolerance="+/- 10%", Value (uF)="10 uF", Voltage=16V, ComponentLink1Description=Digikey, ComponentLink1URL=https://www.digikey.com/en/products/detail/kyocera-avx/F981A106MMA/4004990, Made By="Dylan T", Supplier 1=Newark
C10 C11: library part CAPACITOR_22000uF_Radial, "Cap 22000uF 25V 20% Aluminum Radial Through Hole", Supplier Part Number 1=493-12405-ND, Voltage Range=6.3-450V, Made By="Cole Davis", Supplier 1=Digi-Key, Verified By=Name
C14 C15: library part CAPACITOR_0.1uF_0603, "Cap 100nF 6.3V +/-10% / Ceramic 0603", Supplier Part Number 1=399-15351-1-ND, Tolerance="+/- 10%", Voltage=6.3V, ComponentLink1Description=Datsheet, ComponentLink1URL=https://www.mouser.com/datasheet/2/212/KEM_C1002_X7R_SMD-1102033.pdf, Made By="Flip B", Supplier 1=Digi-Key
D1: "Zener Diode", Package=SOD-123, Power=410mW, Supplier Part Number 1=3757-BZT52-C10_R1_00001CT-ND, Voltage - Zener=10V, ComponentLink1Description=Datasheet, ComponentLink1URL=https://www.panjit.com.tw/upload/datasheet/BZT52-C2V4_SERIES.pdf, Made By="Nathan A", Supplier 1=Digi-Key
D1C: library part LED_RGB_4SMD, "LED RGB CLEAR 4SMD", Blue Forward Current=5mA, Blue Forward Voltage=2.8V, Color=RGB, Package=4-SMD, Red Forward Voltage=1.8V, Supplier Part Number 1=1080-1552-1-ND, ComponentLink1Description=Datasheet, ComponentLink1URL=https://everlightamericas.com/index.php?controller=attachment&id_attachment=3220, Green Forward Current=5mA, Green Forward Voltage=2.8V, Made By="Robert Pafford", Red Forward Current=5mA, Supplier 1=Digi-Key
D2: library part LED_Blue_0603, "LED Blue Vf= 3.2V If = 0.020A / 150060BS75000", Color=Blue, Forward Current=20mA, Forward Voltage=3.2V, Package=0603, Supplier Part Number 1=732-4966-1-ND, Made By="Robert Pafford", Supplier 1=Digi-Key
D3 D4: library part LED_Green_0603_3V, "LED Green Vf= 3V If = 0.005A / IN-S63AT5G", Color=Green, Forward Current=5mA, Forward Voltage=3V, Package=0603, Supplier Part Number 1=1830-1062-1-ND, ComponentLink1Description=Datasheet, ComponentLink1URL=https://www.we-online.de/katalog/datasheet/150060GS75000.pdf, Made By="Robert Pafford", Supplier 1=Digi-Key
D5 D6 D7: library part SCHOTTKY_30V_3A, "Schottky Diode, 30V reverse breakdown, 3A, Vf = 0.500V", Forward Current=3A, Forward Voltage=500mV, Package=DO-214AB, Supplier Part Number 1=7513269, ComponentLink1Description=Datasheet, ComponentLink1URL=https://www.onsemi.com/pdf/datasheet/mbr0520lt1-d.pdf, Made By="Tyson N.", Supplier 1=RSComponents
D8 D10: library part LED_Red_0603, "LED Red Vf= 2V If = 0.020A / 150060RS75000", Color=Red, Forward Current=20mA, Forward Voltage=2V, Package=0603, Supplier Part Number 1=732-4978-1-ND, Made By="Robert Pafford", Supplier 1=Digi-Key
D9: "Zener Diode", Package=SOD-123, Power=410mW, Supplier Part Number 1=50AC7315, Voltage - Zener=10V, ComponentLink1Description=Datasheet, ComponentLink1URL=https://www.panjit.com.tw/upload/datasheet/BZT52-C2V4_SERIES.pdf, Made By="Nathan A", Supplier 1=Newark
D11: library part RCLAMP0504S.TCT, "25V Clamp 6A (8/20µs) Ipp Tvs Diode Surface Mount SOT-23-6", Breakdown Voltage (Min)=6V, Clamping Voltage (Max)=25V, Reverse Standoff Voltage (Typ)=5V, Supplier Part Number 1=RCLAMP0504SCT-ND, Made By="Robert Pafford", Supplier 1=Digi-Key
DEBUG_CONN: library part HEADER_2x10PIN_2.54MM, "CONN HEADER VERT 20POS 2.54MM", Supplier Part Number 1=Z8747-ND, Made By="Tyson Nguyen", Supplier 1=Digi-Key
J1: library part "Slide DPDT Switch", "SWITCH SLIDE DPDT 6A 28V Through Hole", Manufacturer_Part_Number=1201M2S3CQE2, Mfr_Name=C&K, Supplier Part Number 1=36AH1005, Copyright="Copyright (C) 2022 Ultra Librarian. All rights reserved.", RefDes=RefDes, Supplier 1=Newark, Type=DEV
J1R: library part TC2030_SWD, "TagConnect TC2030 ARM SWD 6-pin"
J2: library part CONN_MICROUSB, "Amphenol Micro USB-B / USB2.0 5 Pin Right Angle SMD", Color=Silver, Current Per Pin=1.8A, Manufacturer=Amphenol, Supplier Part Number 1=609-4613-1-ND, ComponentLink1Description=Datasheet, ComponentLink1URL=https://cdn.amphenol-icc.com/media/wysiwyg/files/documentation/datasheet/inputoutput/io_usb_micro.pdf?__cf_chl_jschl_tk__=05693735e19256298f6ef6ca2bb2e65c376a4f56-1625503833-0-Abitsb0-ufjOXJYs_S3J3r2iTn-nObalbmXUksF1VvO_h_WEmRdMlUD1I8-hmWSEVWzY1pirKnrPZWfgY3851qyBZe5ZvnNQePLGIzUgdEIQBVUyW36RsbYpDLEWxJ4horD-5gChFgobLYqwmG5aHl0E8lIn_twwPPrOxilK2gP0q9t_CNOs_u5fMqXvXUrlsOv8tIE2NRlu6NVP8qtkL2GjhlkeTUbDMF8WvvpPDTFOgvZ4Y16Ej8F8AhWos88mo5B1HssXozw0XrkJQIqERITUu6rqloz9kf4ZzhBHtDAt-IkiAFY_Ds9SW8FYKKTtINJVpHZQ6Gyu1FFM4Dc9MO0maE8_mmNcwlxqyRoRk_MPWW8VyByXWM5RSp52jteRKw7FeI9WIYvCbPAOy0Eyib-aseIQsnGbglBcUY6_2xp8GYaJM38H3dNvBPsSOfJBPndKedwKHllxjkucXn6xsN0sDXkpGN-cu8_2bDTJ0g-uUucKSCooYX-ApSDNGpkA_p9zv1SOAD8c0zaZVmtiBsN75QpVz2rzq9_BFxOywPvR, Configuration="Right Angle", Created By="Flip B", Number of Positions=5, Pitch=0.65mm, Series=10118192, Supplier 1=Digi-Key
LED_CONN: library part CONN_JST_XH254_3POS_VERT, "JST XH 2.54mm Pitch 3 Pos Vertical", Color=White, Current Per Pin=4A, Manufacturer=JST, ComponentLink1Description="Purchase Link", ComponentLink1URL=https://www.amazon.com/460PCS-XH2-54-Connector-Terminal-Connectors/dp/B09DBGVX5C, Configuration=Vertical, Created By="Robert P", NOTE="Do not use JST 2.5mm parts with this footprint. JST does not make 2.54mm pitch pins, rather only clones make this connector!", Number of Positions=3, Pitch=2.54mm, Series="XH 2.54"
LID_CONN: library part "CONN_MOLEX_MINIFIT JR_14POS_R/A", "Molex Minifit Jr. 5569  / 14 Pos R/A Natural", Color=Natural, Current Per Pin=13A, Manufacturer=Molex, Supplier Part Number 1=WM21356-ND, ComponentLink1Description=Datasheet, ComponentLink1URL=https://www.molex.com/pdm_docs/ps/PS-5556-001.pdf, Configuration="Right Angle", Created By="Flip B", Number of Positions=14, Pitch=4.2mm, Series="Minifit Jr 5569", Supplier 1=Digi-Key
POWER_CONN: library part "CONN_MOLEX_MINIFIT JR_6POS_R/A", "Molex Minifit Jr. 5569  / 6 Pos R/A Natural", Color=Natural, Current Per Pin=13A, Manufacturer=Molex, Supplier Part Number 1=WM1353-ND, ComponentLink1Description=Datasheet, ComponentLink1URL=https://www.molex.com/pdm_docs/ps/PS-5556-001.pdf, Configuration="Right Angle", Created By="Flip B", Number of Positions=8, Pitch=4.2mm, Series="Minifit Jr 5569", Supplier 1=Digi-Key
Q1: "P-Channel 30V 4.3A (Ta) 1.38W (Ta) Surface Mount SOT23", Supplier Part Number 1=DMP3056L-7DICT-ND, Created By="John Ulm", Id=-4.3A, Reviewed By=---, Supplier 1=Digi-Key, VDSS (Max)=-30V, Vgss (Max)=+-25V
Q2 U4 U5 U11 U12 U13 U14 U15 U18: "N-Channel 30 V 5.8A (Ta) 1.4W (Ta) Surface Mount SOT-23-3", Amp Rating="5.8 A", Package=SOT23-3L, Power Dissipation="1.4W (Ta)", Supplier Part Number 1=785-1004-1-ND, Created By="Dylan T", FET Type=N-Channel, Manufacturer _Part_Number=AO3404A, Rds (on)="28mOhm @ 5.8A, 10V", SourceLibrary=ON_Semiconductor_2020-01-13, Supplier 1=Digi-Key, Vdss=30V, Vendor="Alpha & Omega Semiconductor Inc.", Vgs (Max)="3V @ 5.8A, 10V", Vgs (th)="3V @ 250µA"
R1 R23: library part RESISTOR_100K_0603_1, "RES 100k OHM 5% 1/10W 0603", Digikey Part Numer=CR0603-JW-104ELFTR-ND, Supplier Part Number 1=CR0603-JW-104ELFCT-ND, Tolerance="+/- 5%", Value  (Ohms)=100K, ComponentLink1Description=Datasheet, ComponentLink1URL=https://www.bourns.com/docs/product-datasheets/CRxxxxx.pdf, Made By="Flip B", Supplier=Digikey, Supplier 1=Digi-Key, Wattage=1/10W
R1C R4C R4R R5R R6C: library part RESISTOR_10K_0402, "RES 10k OHM 1% 1/16W 0402", Digikey Part Numer=CR0603-JW-104ELFTR-ND, Supplier Part Number 1=YAG3436CT-ND, Tolerance="+/- 1%", Value  (Ohms)=10K, Made By="Robert Pafford", Supplier=Digikey, Supplier 1=Digi-Key, Wattage=1/16W
R1R R6R R7R: library part RESISTOR_1K_0402, "RES 1k OHM 1% 1/16W 0402", Digikey Part Numer=CR0603-JW-104ELFTR-ND, Supplier Part Number 1=13-AC0402FR-131KLCT-ND, Tolerance="+/- 1%", Value  (Ohms)=1K, Made By="Robert Pafford", Supplier=Digikey, Supplier 1=Digi-Key, Wattage=1/16W
R2 R5: library part RESISTOR_5.1K_0805, "RES 5.1k OHM 1% 1/8W 0805", Digikey Part Numer=CR0603-JW-104ELFTR-ND, Supplier Part Number 1=53W4863, Tolerance="+/- 5%", Value  (Ohms)=5.1K, ComponentLink1Description=Datasheet, ComponentLink1URL=https://www.bourns.com/docs/product-datasheets/CRxxxxx.pdf, Made By="Dylan Trainor", Supplier=Digikey, Supplier 1=Newark, Wattage=1/8W
R2C R3C: library part RESISTOR_60.4_0402, "RES 60.4 OHM 1% 1/16W 0402", Digikey Part Numer=CR0603-JW-104ELFTR-ND, Supplier Part Number 1=13-AC0402FR-0760R4LCT-ND, Tolerance="+/- 1%", Value  (Ohms)=60.4, Made By="Robert Pafford", Supplier=Digikey, Supplier 1=Digi-Key, Wattage=1/16W
R2R R3R: library part RESISTOR_27_0402, "RES 27 OHM 1% 1/16W 0402", Digikey Part Numer=CR0603-JW-104ELFTR-ND, Supplier Part Number 1=YAG5278DKR-ND, Tolerance="+/- 1%", Value  (Ohms)=27, Made By="Robert Pafford", Supplier=Digikey, Supplier 1=Digi-Key, Wattage=1/16W
R3: library part RESISTOR_33K_0805, "RES 33k OHM 5% 1/8W 0805", Digikey Part Numer=CR0603-JW-104ELFTR-ND, Supplier Part Number 1=65T8819, Tolerance="+/- 5%", Value  (Ohms)=33K, ComponentLink1Description=Datasheet, ComponentLink1URL=https://www.bourns.com/docs/product-datasheets/CRxxxxx.pdf, Made By="Dylan Trainor", Supplier=Digikey, Supplier 1=Newark, Wattage=1/8W
R4: library part RESISTOR_7.5K_0603, "RES 7.5k OHM 5% 1/10W 0603", Digikey Part Numer=CR0603-JW-104ELFTR-ND, Supplier Part Number 1=CRCW06037K50JNEA, Tolerance="+/- 5%", Value  (Ohms)=7.5K, ComponentLink1Description=Datasheet, ComponentLink1URL=https://www.bourns.com/docs/product-datasheets/CRxxxxx.pdf, Made By="Dylan Trainor", Supplier=Digikey, Supplier 1="Arrow Electronics", Wattage=1/8W
R5C: library part RESISTOR_604_0402, "RES 604 OHM 1% 1/16W 0402", Digikey Part Numer=CR0603-JW-104ELFTR-ND, Supplier Part Number 1=13-AC0402FR-07604RLCT-ND, Tolerance="+/- 1%", Value  (Ohms)=604, Made By="Robert Pafford", Supplier=Digikey, Supplier 1=Digi-Key, Wattage=1/16W
R6: library part RESISTOR_0.2_1%_2512, "RES 0.2 OHM 1% 2W 2512", Digikey Part Numer=CR0603-JW-104ELFTR-ND, Supplier Part Number 1=CSRN2512FKR200, Tolerance="+/- 1%", Value  (Ohms)=0.2, ComponentLink1Description=Datasheet, ComponentLink1URL=https://www.bourns.com/docs/product-datasheets/CRxxxxx.pdf, Made By="Dylan Trainor", Supplier=Stackpole, Supplier 1=Avnet, Wattage=2W
R7: library part RESISTOR_1.2K_0805, "RES 1.2k OHM 5% 1/2W 0805", Supplier Part Number 1=P1.2KADCT-ND, Tolerance="+/- 5%", Value  (Ohms)=1.2K, Made By="Robert Pafford", Supplier 1=Digi-Key, Wattage=1/2W
R7C R8C: library part RESISTOR_200_0402, "RES 200 OHM 1% 1/16W 0402", Digikey Part Numer=CR0603-JW-104ELFTR-ND, Supplier Part Number 1=YAG3453CT-ND, Tolerance="+/- 1%", Value  (Ohms)=200, Made By="Robert Pafford", Supplier=Digikey, Supplier 1=Digi-Key, Wattage=1/16W
R8 R9: library part RESISTOR_62_0603, "RES SMD 62 OHM 1% 1/4W 0603", Digikey Part Numer=CR0603-JW-104ELFTR-ND, Supplier Part Number 1=541-RCS060362R0FKEACT-ND, Tolerance="+/- 1%", Value  (Ohms)=62, ComponentLink1Description=Datasheet, ComponentLink1URL=https://www.bourns.com/docs/product-datasheets/CRxxxxx.pdf, Made By="Robert Pafford", Supplier=Digikey, Supplier 1=Digi-Key, Wattage=1/4W
R10 R18: library part RESISTOR_4.7K_0603, "RES 4.7k OHM 5% 1/10W 0603", Digikey Part Numer=CR0603-JW-104ELFTR-ND, Supplier Part Number 1=RMCF0603JT4K70CT-ND, Tolerance="+/- 5%", Value  (Ohms)=4.7K, Made By="Robert Pafford", Supplier=Digikey, Supplier 1=Digi-Key, Wattage=1/10W
R11 R12 R13 R14 R15 R16 R17 R19 R24 R25 R26 R27 R28 R29 R30 R31 R32 R33 R34 R35 R36 R37 R38 R39 R40 R41: library part RESISTOR_10K_0603, "RES 10k OHM 5% 1/10W 0603", Digikey Part Numer=CR0603-JW-104ELFTR-ND, Supplier Part Number 1=2019-RK73B1JTTD103JCT-ND, Tolerance="+/- 5%", Value  (Ohms)=10K, ComponentLink1Description=Datasheet, ComponentLink1URL=https://www.bourns.com/docs/product-datasheets/CRxxxxx.pdf, Made By="Robert Pafford", Supplier=Digikey, Supplier 1=Digi-Key, Wattage=1/8W
R20: library part RESISTOR_100K_0.5%_0603, "RES 100k OHM 0.5% 1/10W 0603", Digikey Part Numer=CR0603-JW-104ELFTR-ND, Supplier Part Number 1=311-2395-1-ND, Tolerance="+/- 0.5%", Value  (Ohms)=100K, ComponentLink1Description=Datasheet, ComponentLink1URL=https://www.bourns.com/docs/product-datasheets/CRxxxxx.pdf, Made By="John Ulm", Supplier=Digikey, Supplier 1=Digi-Key, Wattage=1/10W
R21: "RES 35601 100R 6W 5%", Manufacturer_Part_Number=3550120RJT, Mfr_Name="TE Connectivity", Supplier Part Number 1=34AH4272, Copyright="Copyright (C) 2022 Ultra Librarian. All rights reserved.", RefDes=RefDes, Supplier 1=Newark, Type=DEV
R22: library part RESISTOR_12K_0.5%_0603, "RES 12k OHM 0.5% 1/10W 0603", Digikey Part Numer=CR0603-JW-104ELFTR-ND, Supplier Part Number 1=311-2415-1-ND, Tolerance="+/- 0.5%", Value  (Ohms)=12K, ComponentLink1Description=Datasheet, ComponentLink1URL=https://www.bourns.com/docs/product-datasheets/CRxxxxx.pdf, Made By="John Ulm", Supplier=Digikey, Supplier 1=Digi-Key, Wattage=1/8W
SW1C: library part CAS-220TA_CAN_TERM, "GOLD SWITCH FLUSH SLIDE DPDT 100MA 6V", Current Rating="100 mA", Supplier Part Number 1=CAS220JCT-ND, Voltage Rating=6VDC, Contact Finish=Gold, Made By="Robert Pafford", Supplier 1=Digi-Key, Switch Function=DPDT
SW1R SW2R: library part "Tactile Switch SMD", "WS-TASV J-Bend SMT Tact Switch, SPST-NO, 16VDC, 50mA, 260g", Manufacturer="Wurth Elektronik", Operating Temperature Max=85°C, Operating Temperature Min=-40°C, Rated Current=50mA, Rated Voltage=16VDC, Category="Tact Switches", Circuit=SPST-NO, ComponentLink1Description="Website Link", ComponentLink1URL=https://www.we-online.com/redexpert/article/434123025826?ad, ComponentLink2Description="Datasheet Link", ComponentLink2URL=https://www.we-online.com/redexpert/spec/434123025826?ad, Contact Material="Stainless Steel", Contact Plating=Silver, Height=2.5mm, Length=4.2mm, Manufacturer Part Number=434123025826, Match Code=WS-TASV, Mount="Surface Mount", Operation Force=260g, Packaging="Tape and Reel", Terminal Material="Copper Alloy", Terminal Plating=Silver, Washable=No, Width=3.2mm
U1: "Bipolar Motor Driver DMOS Parallel 16-HTSSOP", Manufacturer="Texas Instruments", PartNumber=DRV8801PWP, Supplier Part Number 1=296-25378-1-ND, CompType=IC, Copyright="Copyright (C) 2022 Ultra Librarian. All rights reserved.", Manufacturer_Part_Number=DRV8801PWPR, Mfr_Name="Texas Instruments", MountType=SMT, PackageReference=PWP0016B, RefDes=RefDes, RoHS=Y, Supplier 1=Digi-Key, Type=DEV
U1C: "CANbus Controller CAN 2.0 SPI Interface 14-SOIC", Made By="Robert Pafford", Max FD Rate="8 Mbps"
U1R: "Raspberry Pi RP2040", Crystal Frequency="12 MHz", Input Voltage=3.3V, Available Busses="SPI, I2C, PWM, USB", ComponentLink1Description=DigiKey, ComponentLink2Description=Datasheet, ComponentLink2URL=https://datasheets.raspberrypi.org/rp2040/rp2040-datasheet.pdf, Made By="Robert Pafford", Number of GPIOs=29
U2: "No Description Available", Mfr_Name="Traco Power", Supplier Part Number 1=1951-1797-ND, Copyright="Copyright (C) 2022 Ultra Librarian. All rights reserved.", Manufacturer_Part_Number="TMR 6-2415", RefDes=RefDes, Supplier 1=Digi-Key, Type=DEV
U2C: library part TJA1442AT, "CAN Interface IC High-Speed CAN Transceiver with Standby Mode", Supplier Part Number 1=771-TJA1442AT/0Z, Made By="Robert Pafford", Max Data Rate=5Mbps, Supplier 1=Mouser
U2R: "IC FLASH 128MBIT SPI/QUAD 8SOIC", Supplier Part Number 1=W25Q128JVSIQ-ND, Made By="Robert Pafford", Size=128M, Supplier 1=Digi-Key
U3: "Linear Voltage Regulator IC Positive Fixed 1 Output 3A TO-263-3", Mfr_Name=Microchip, Copyright="Copyright (C) 2022 Ultra Librarian. All rights reserved.", Manufacturer_Part_Number=MIC29300-12WU-TR, RefDes=RefDes, Supplier 1="Arrow Electronics", Supplier Part Number 1=MIC29300-12WU-TR, Type=DEV
U6 U7 U17: "P-Channel 10.8A (Ta), 50A (Tc) 2.4W (Ta), 69W (Tc) Surface Mount D-PAK (TO-252AA)", Amp Rating="10.8 A", Package="D-PAK (TO-252AA)", Power Dissipation="2.4W (Ta), 69W (Tc)", Supplier Part Number 1=FDD4141CT-ND, Created By="Dylan T", FET Type="P-Channel, Power", Manufacturer_Part_Number=FDD4141, Rds (on)="12.3mOhm @ 12.7A, 10V", SourceLibrary=ON_Semiconductor_2020-01-13, Supplier 1=Digi-Key, Vdss="40 V", Vendor="ON Semiconductor", Vgs (Max)=±20V, Vgs (th)="3V @ 250µA"
U8 U9 U10 U16: library part IPD78CN10NGATMA1, "N-Channel 100 V 13A (Tc) 31W (Tc) Surface Mount PG-TO252-3", Continuous Drain Current=13A, Supplier Part Number 1=IPD78CN10NGATMA1CT-ND, Created By="John Ulm", Supplier 1=Digi-Key, VDS=100V, Verified By=----, Vg(th)=2V<4V
U19: "IC REG LIN 3.3V 800MA SOT223-4", Manufacturer="Texas Instruments", Package=SOT-223-4, PartNumber=LM1117IMP-3.3/NOPB, Supplier Part Number 1=LM1117IMPX-3.3/NOPBCT-ND, Amp Out=800mA, Created By="Dylan T", Supplier 1=Digi-Key, Vin (Max)=15V, Vout (Min/Fixed)=3.3V
U20: library part PI4ULS5V202UEX, "Voltage Level Translator Bidirectional 1 Circuit 2 Channel 20Mbps 8-MSOP", Supplier Part Number 1=PI4ULS5V202UEXDICT-ND, Voltage Range="1.2 V ~ 5.5 V", Channel Type=Bidirectional, Channels=2, Made By="Robert Pafford", Max Rate="20 Mbps", Supplier 1=Digi-Key
Y1R: library part CRYSTAL_12MHz_SMD_SMALL, "12 MHz ±20ppm Crystal 18pF 100 Ohms 4-SMD, No Lead (3.2x2.5mm)", Frequency="12 MHz", Load Capacitance=18pF, Supplier Part Number 1=2151-RH100-12.000-18-2030-EXT-TRCT-ND, ESR="100 Ohms", Made By="Robert Pafford", Supplier 1=Digi-Key

## Free pads (board coordinates)
  round 60 hole 170: 1(250,250) 1(250,4750) 1(6750,250) 1(6750,4750)

## Via types
v1: diameter 20, hole 12, Top Layer to Bottom Layer, tented both sides, 244 vias
v2: diameter 50, hole 28, Top Layer to Bottom Layer, tented both sides, 22 vias
v3: diameter 30, hole 18, Top Layer to Bottom Layer, tented both sides, 13 vias
v4: diameter 30, hole 16, Top Layer to Bottom Layer, tented both sides, 10 vias
v5: diameter 40, hole 25, Top Layer to Bottom Layer, tented both sides, 4 vias
v6: diameter 40, hole 20, Top Layer to Bottom Layer, tented both sides, 3 vias
v7: diameter 50, hole 38, Top Layer to Bottom Layer, tented both sides, 3 vias
v8: diameter 40, hole 28, Top Layer to Bottom Layer, tented both sides, 2 vias
v9: diameter 80, hole 58, Top Layer to Bottom Layer, tented both sides, 1 vias

## Nets (pads, with @x,y where several pads share a name; then routed paths per layer and width w, separated by ;. In a path a pad name is that pad's centre, name@x,y a point inside that pad or via, vN(x,y) a via of type N, cw(c..) or ccw(c..) an arc to the next point about the centre after c; other vN are vias at no path point)
1v1_RP2040: C11R.1 C12R.1 C13R.1 U1R.23 U1R.45 U1R.50 | length 512.9
  Top Layer w8: U1R.50@4376.63,1737.46 4376.63,1706.62 4385,1698.25 v1(4385,1695) v1(4455,1695) 4455.3,1695.3 4455.3,1737.4 U1R.45@4455.37,1737.46 ; U1R.23@4408.12,1466.79 4408.12,1496.93 4414.25,1503.06 v1(4415,1503.06)
  Bottom Layer w8: C13R.1@4345,1695 v1(4385,1695) 4385,1552.3 4415,1522.3 v1(4415,1503.06) ; C12R.1@4417.3,1466.55 v1@4417.3,1503.06 ; v1(4455,1695) 4453.11,1696.89 4453.11,1720.85 C11R.1@4455,1727.87
3V3_RP2CAN: C1C.1 C3C.1 C3R.1 C4R.1 C5C.1 C5R.1 C6R.1 C7R.1 C8R.1 C9R.1 C10R.1 C13.1 C14.1 D1C.4 DEBUG_CONN.2 J1R.2 R1C.1 R4C.1 R4R.1 R5R.1 R25.1 R26.1 R27.1 R28.1 R29.1 R30.1 U1C.14 U1R.1 U1R.10 U1R.22 U1R.33 U1R.42 U1R.43 U1R.44 U1R.48 U1R.49 U2C.5 U2R.8 U19.2 U19.4 U20.1 | length 10140.7
  Top Layer w8: v1@2346.5,3803.5 v1(2345,3805) 2345,3858.5 R29.1@2346.5,3860 ; C14.1@2605,2975 v1(2605,3015) ; R5R.1@4175,1756.3 4178.94,1756.3 4196.09,1739.15 4205.85,1739.15 v1@4210,1735 ; v1(4197,1558.5) 4200.25,1558.5 4204.5,1562.76 U1R.10@4249.17,1562.76 ; v1(4210.32,1736.85) 4212.61,1734.56 4212.61,1727.88 U1R.1@4235.94,1704.55 ; v1(4368.45,1513.45) 4371.69,1513.45 4385.3,1527.06 4449.56,1527.06 4457.5,1535 4464.13,1535 4479.13,1520 v1(4480,1520) 4481.83,1521.83 4481.83,1542 4502.52,1562.69 4519.77,1562.69 U1R.33@4519.83,1562.76 ; v1@4372.3,1506.05 4392.31,1486.03 4392.31,1466.85 U1R.22@4392.37,1466.79 ; U1R.49@4392.37,1737.46 U1R.49@4392.37,1737.46 v4@4392.44,1788.72 ; v4@4395.77,1789.08 4397.33,1789.08 4408.12,1778.29 U1R.48@4408.12,1737.46 ; U1R.44@4471.11,1737.46 4471.11,1762.01 4474.11,1765 4474.11,1784.25 C4R.1@4479.86,1790 4486.8,1783.06 4486.8,1737.52 U1R.43@4486.86,1737.46 4486.86,1723.14 4505.45,1704.55 4519.77,1704.55 U1R.42@4519.83,1704.49 ; J1R.2@4477.13,845.5 4483.31,845.5 4493.31,835.5 4519.41,835.5 4582.13,835.5 ; U1R.42@4533.06,1704.55 4553.51,1725 v1(4555,1725)
  Top Layer w10: C5C.1@4117.87,1155 C5C.1@4120,1155
  Top Layer w12: 4830,1545 4830,1469.82 4811.19,1451.01 4811.19,1278.4 4882.78,1206.81 4882.78,1179.94 U1C.14@4885,1177.72 4883.84,1176.56 4883.84,1143.98 4877.13,1137.26 C1C.1@4877.13,1100
  Top Layer w16: v8(3945,2891) 3945.5,2890.5 4011,2890.5 R25.1@4011.5,2890 ; v4(4510,1425) 4510,1421.21 4531.19,1400.02 4531.19,1183.81 4548.81,1166.19
  Top Layer w20: v1(4020,3340) R26.1@4020,3501.5 ; v1(4350,3340) R27.1@4350,3516.5 ; v1(4685,3340) R28.1@4685,3515
  Top Layer w50: R30.1@2883.5,2722.07 R30.1@2883.5,2740 3015,2740 3155,2880 U19.4@3280,2880 U19.2@3530,2880 3689,2880 v2(3705,2896)
  Middle 2 Layer w50: v2(3705,2896) 3940,2896 v8(3945,2891) ; v8@3945,2890 4340,2495 v5(4340,2010)
  Bottom Layer w8: v1(2345,3805) 2345,3273.05 2603.05,3015 v1(2605,3015) ; v1(4197,1456) 4171.59,1481.41 4171.59,1534.59 4195.5,1558.5 v1(4197,1558.5) ; v1@4197,1560 C6R.1@4237.87,1560 ; v1(4210.32,1736.85) 4212.61,1734.56 4212.61,1728.72 4244.21,1697.13 C7R.1@4245,1697.13 ; C8R.1@4355,1467.13 4355,1497.56 4368.45,1511.01 v1(4368.45,1513.45) ; C5R.1@4390,1837.87 4390,1795.95 4395,1790.95 v4(4395,1785) ; v1(4555,1725) C10R.1@4590,1725
  Bottom Layer w16: v4@4400,1790 4455,1845 4455,1885 ; v4(4510,1425) 4510,1427.43 4480,1457.43 v1(4480,1520) 4481.08,1520 4493.96,1532.87 C9R.1@4530,1532.87 4607.87,1532.87 v4(4625,1550) v4@4625,1553.79
  Bottom Layer w20: v8(3945,2891) 3945,3265 v1(4020,3340) v1(4685,3340)
  Bottom Layer w40: v5(4340,715) 4370,685 4649.2,685 4675,710.8 4675,761.57 4698.43,785 v5(4705,785) 4752.47,785 5482.36,55.11 6330.11,55.11 DEBUG_CONN.2@6400,125 ; v5(4340,2010) 4460,1890 4670,1890 v5(4715,1845)
+5V: C1.1 C4C.1 C12.1 C15.1 D11.5 DEBUG_CONN.1 LED_CONN.1 POWER_CONN.5 U2C.3 U19.3 U20.8 | length 14602.6
  Top Layer w8: v1(4760,1015) C4C.1@4805,1015 U2C.3@4805,927.28
  Top Layer w50: POWER_CONN.5@1044.65,4216.06 1148.58,4320 1280,4320 1600,4000 1600,3320 1845,3075 2451.83,3075 2730,3075 C15.1@2822.5,2982.5 ; C15.1@2820,2975 2829.29,2975 2849.29,2995 3473.35,2995 3492.48,2975.87 3524.69,2975.87 3530.55,2970 C12.1@3640,2970 ; 5065,360 5080,375 v2(5080,710)
  Bottom Layer w8: v1(4760,1015) 4760,1015.69 4745,1030.69 4745,1055 4760,1070 5075,1070
  Bottom Layer w50: LED_CONN.1@705,345 755,295 805,295 C1.1@820,280 ; v2@2450,3075 2905,2620 4575,2620 5080,2115 5080,1070 v2(5080,710) 5080,705 5425,360 6280,360 6405,235 6405,230 DEBUG_CONN.1@6400,225
  Bottom Layer w100: LED_CONN.1@705,345 705,3872.67 POWER_CONN.5@1044.65,4212.32
  other v2: 2451.83,3075.88
+12V: C2.2 C4.1 C5.1 C9.1 J1.3 LID_CONN.4 LID_CONN.5 R7.1 U1.9 U3.3 | length 0.7
  Top Layer w30: U3.3@1709.5,2800 U3.3@1710,2799.5
  other v1: 4906.25,2771.11 4936.25,2771.11 4906.25,2806.11 4936.25,2806.11 4905.9,2840.75 4936.25,2841.11 4906.25,2876.11 4936.25,2876.11 4906.25,2911.11 4936.25,2911.11 4905.9,2945.75 4936.25,2946.11
  other v2: 1700,2510 1780,2510 1470,2515 1545,2515 1620,2515 1470,2590 1545,2590 1620,2590 1700,2590 1780,2590
+15V: C8.1 POWER_CONN.6 R13.1 R14.1 R15.1 R19.1 U3.1 | length 4428.2
  Top Layer w20: R19.1@2558.5,3860 2563.5,3865 2563.5,3867.5 2621,3925 v3(2640,3925)
  Top Layer w30: v3(4115,3374) R13.1@4115,3496.5 ; R14.1@4440.01,3516.49 4445,3511.5 v3(4445,3374) ; v3(4770,3374) R15.1@4770,3516.5
  Bottom Layer w30: POWER_CONN.6@1210,4216.06 1526.06,3900 2635,3900 3025,3900 3551,3374 4109,3374 v3(4115,3374) v3(4445,3374) v3(4770,3374)
+24V: 1.2 C10.1 C11.1 D1.2 D5.2 D6.2 D7.2 R11.1 R12.1 R18.2 R20.1 U6.2 U7.2 U16.3 U17.2 | length 1426.2
  Top Layer w20: U16.3@2265,4404.5 2323,4346.5 R18.2@2520,4346.5 ; R12.1@2910,4208.5 3096.64,4208.5 v1(3135.04,4170.1) ; R11.1@3365,4208.5 3541.64,4208.5 v1(3585.04,4165.1)
  Top Layer w40: v8(2950,3640) 2951.5,3638.5 R20.1@2951.5,3500 R20.1@2951.5,3497.5
  Top Layer w50: D1.2@1019.37,3620 1120,3620 v7(1150,3590) 1150,3440.5 1.2@1150.5,3440 ; U17.2@1960,4122.5 1966.5,4129 1966.5,4161.5 2045.87,4240.87 v1(2045.87,4318.75)